# Altium PCB Crabit_V2.PcbDoc (part 1 of 2)
Units mil, origin at the board's own origin, x right, y up, seen from the top; angles counter-clockwise.
Board outline 1492.69 x 1472.87 mil, 4 copper layers (Top Layer, GND, PWR, Bottom Layer), stack 75.156 mil thick; 108 components, 88 nets, 475 pads, 227 vias.
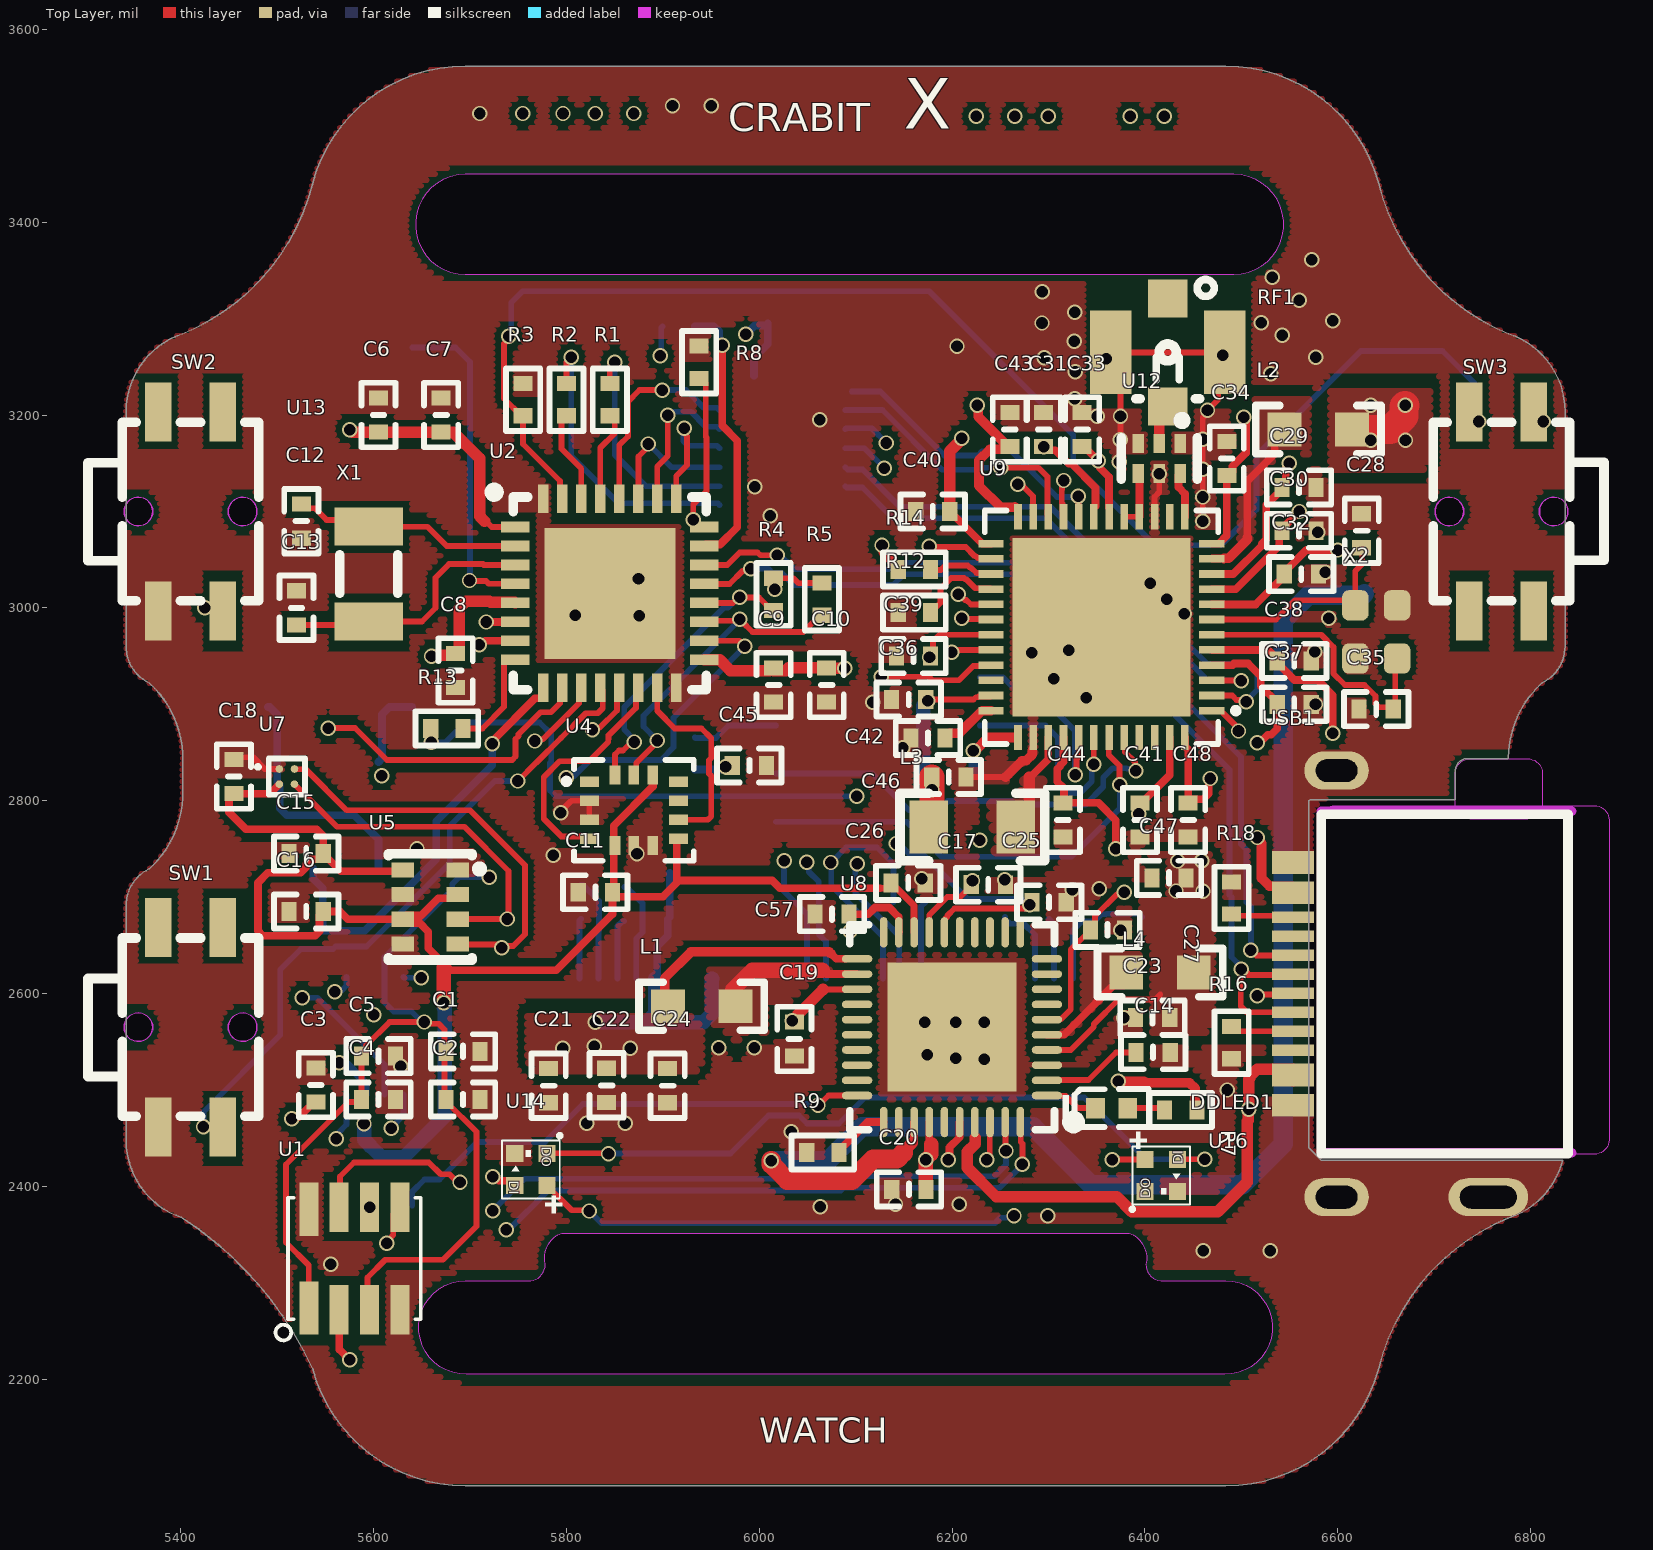
[diagram p0: Top Layer view]
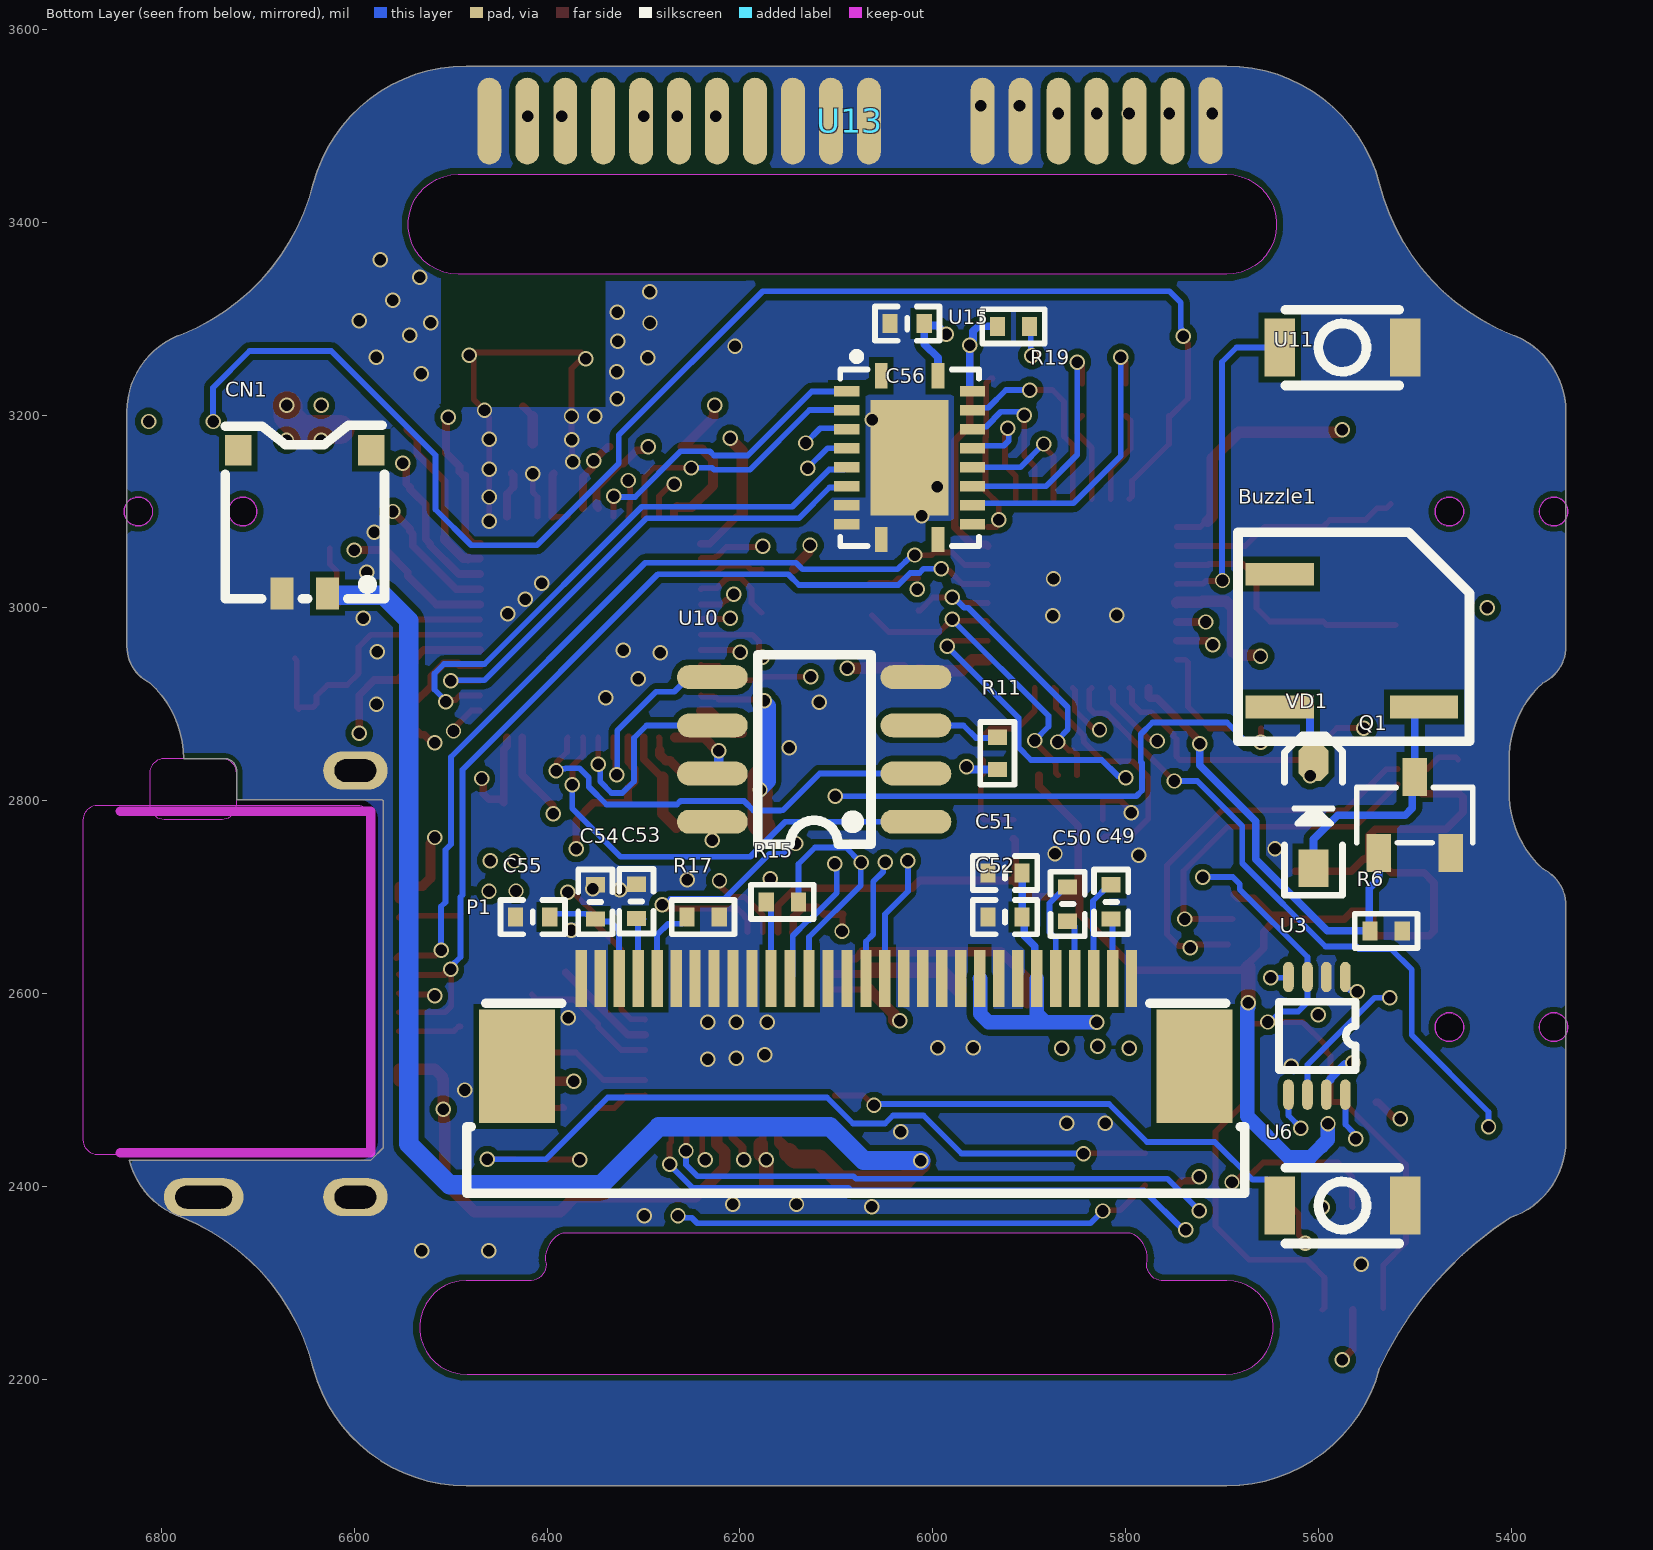
[diagram p1: Bottom Layer view, seen from below]
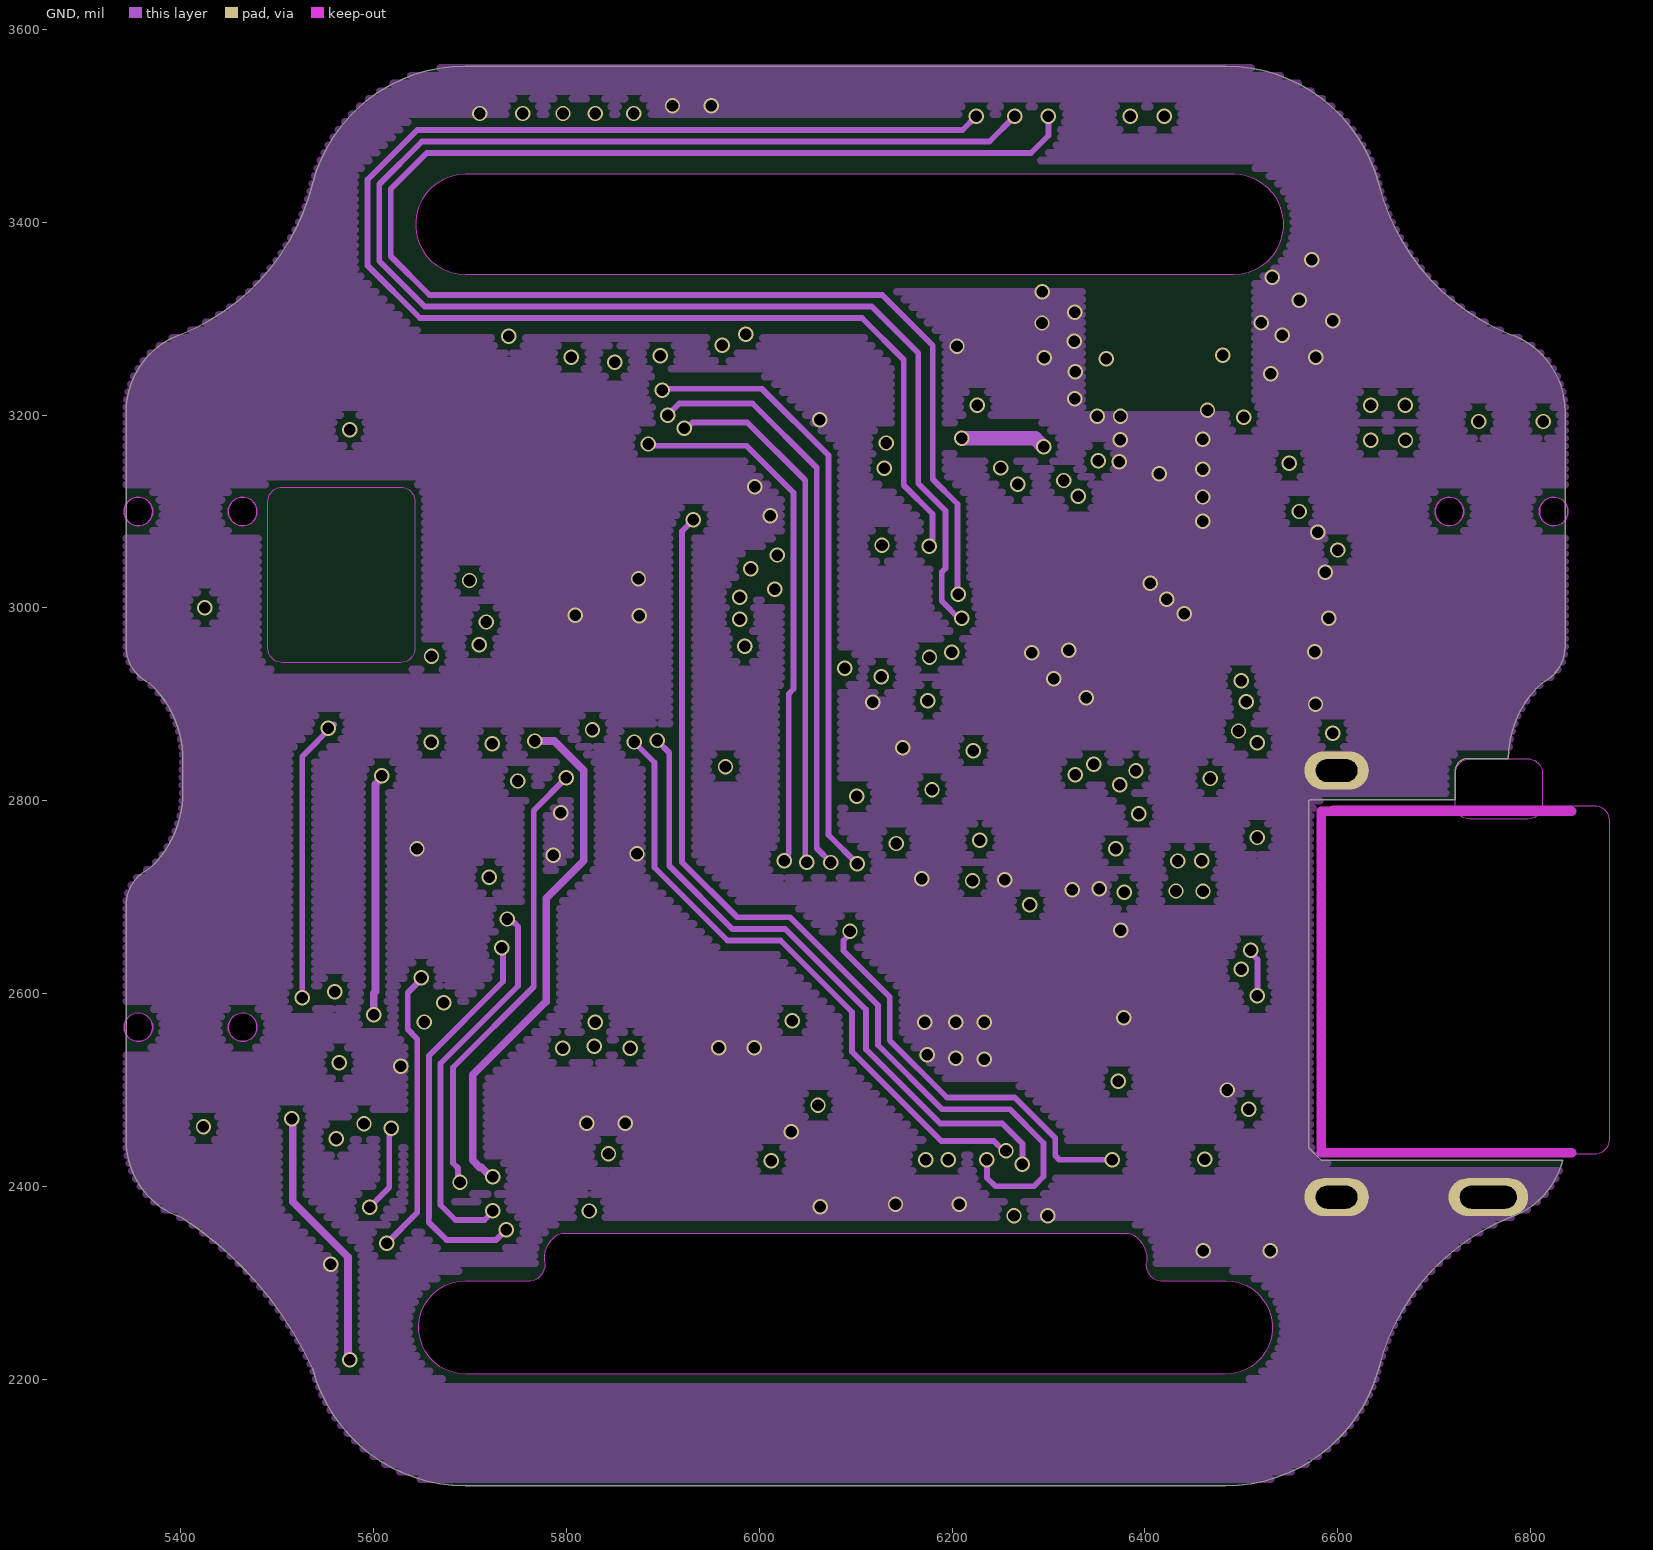
[diagram p2: GND]
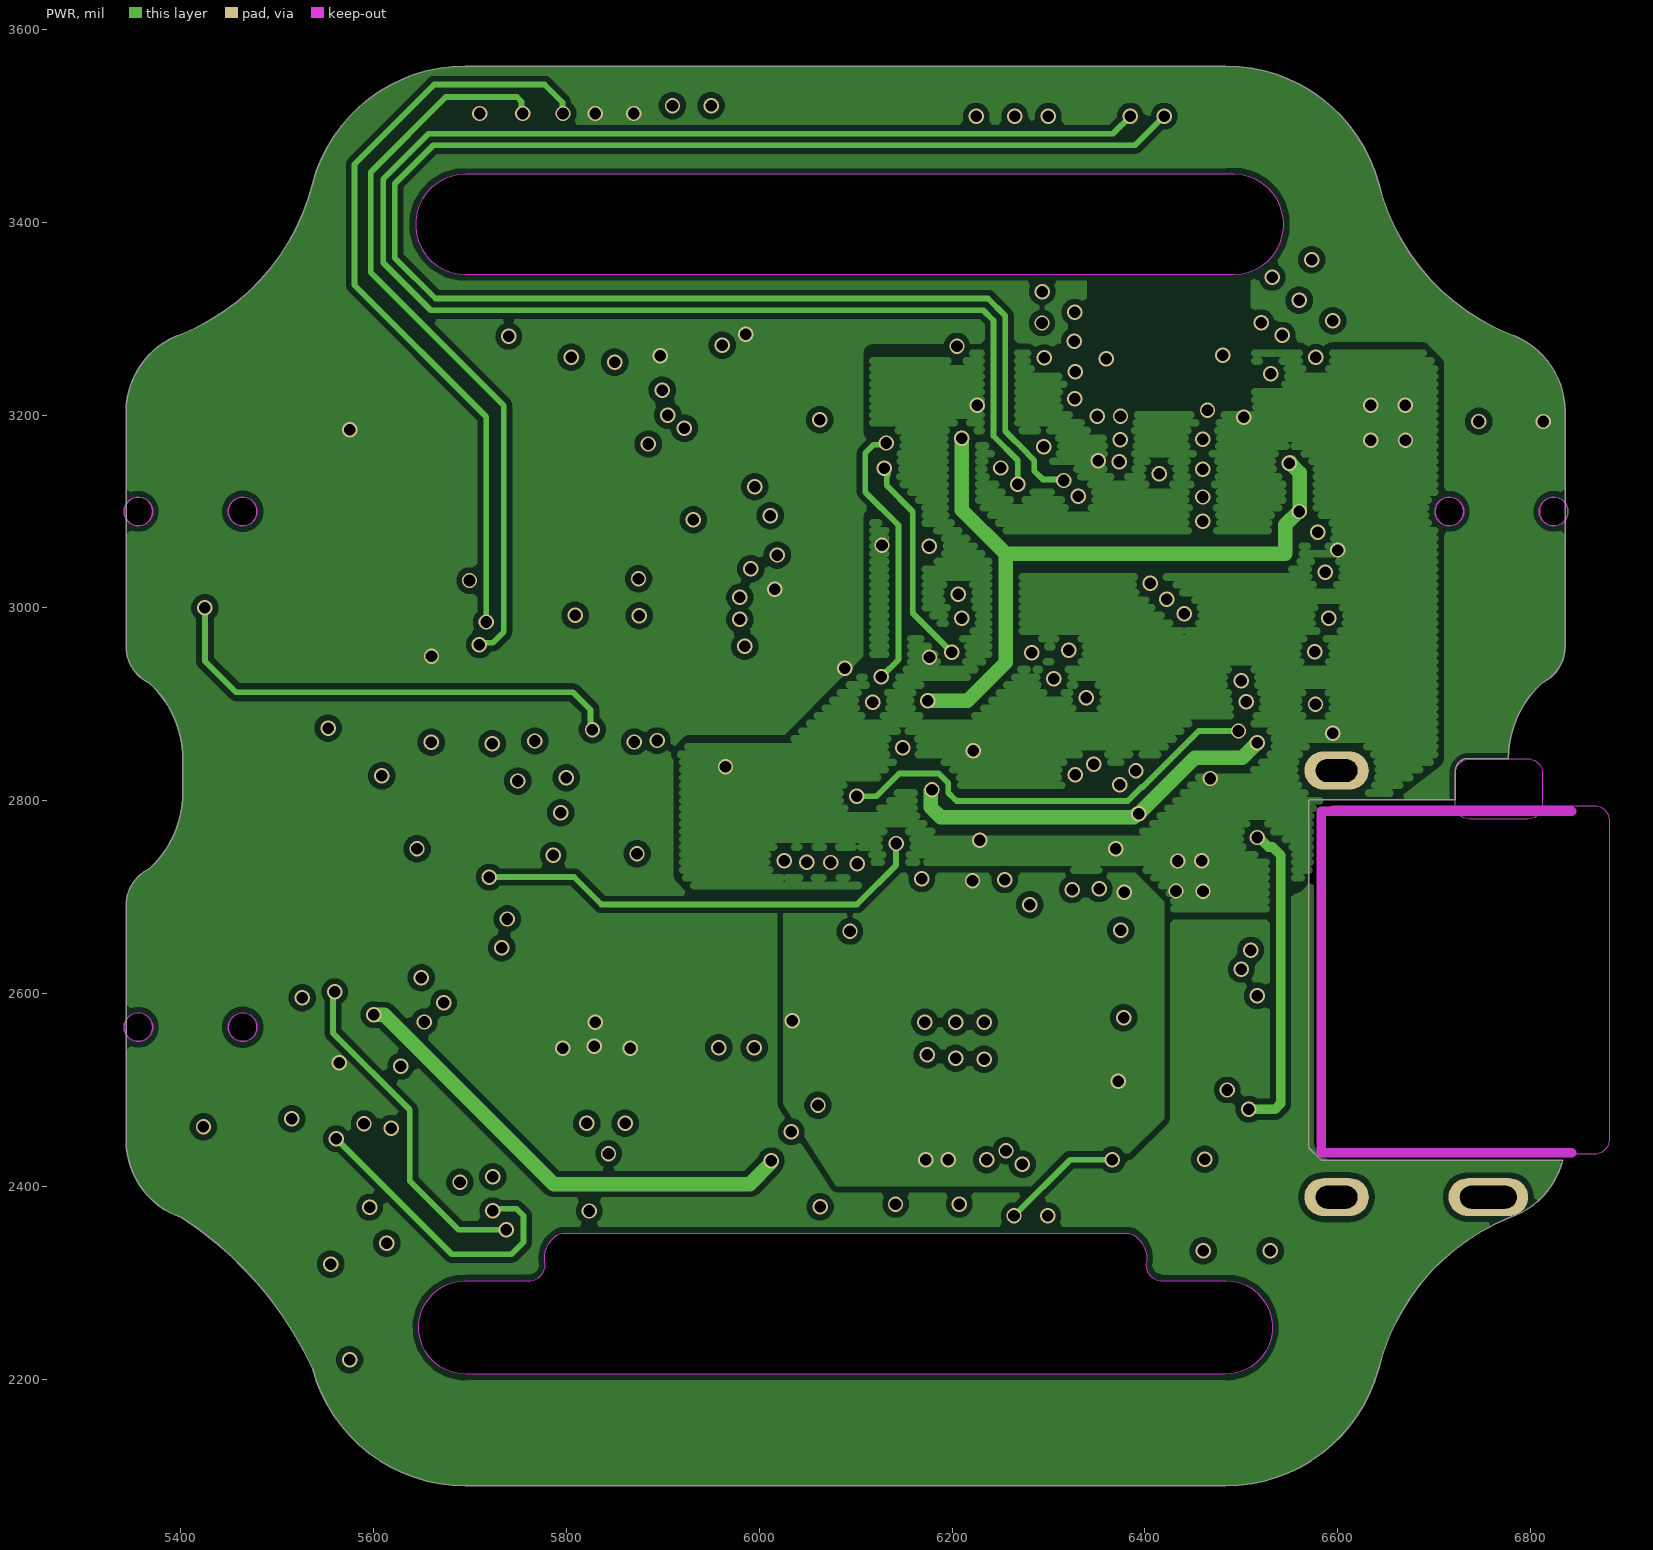
[diagram p3: PWR]
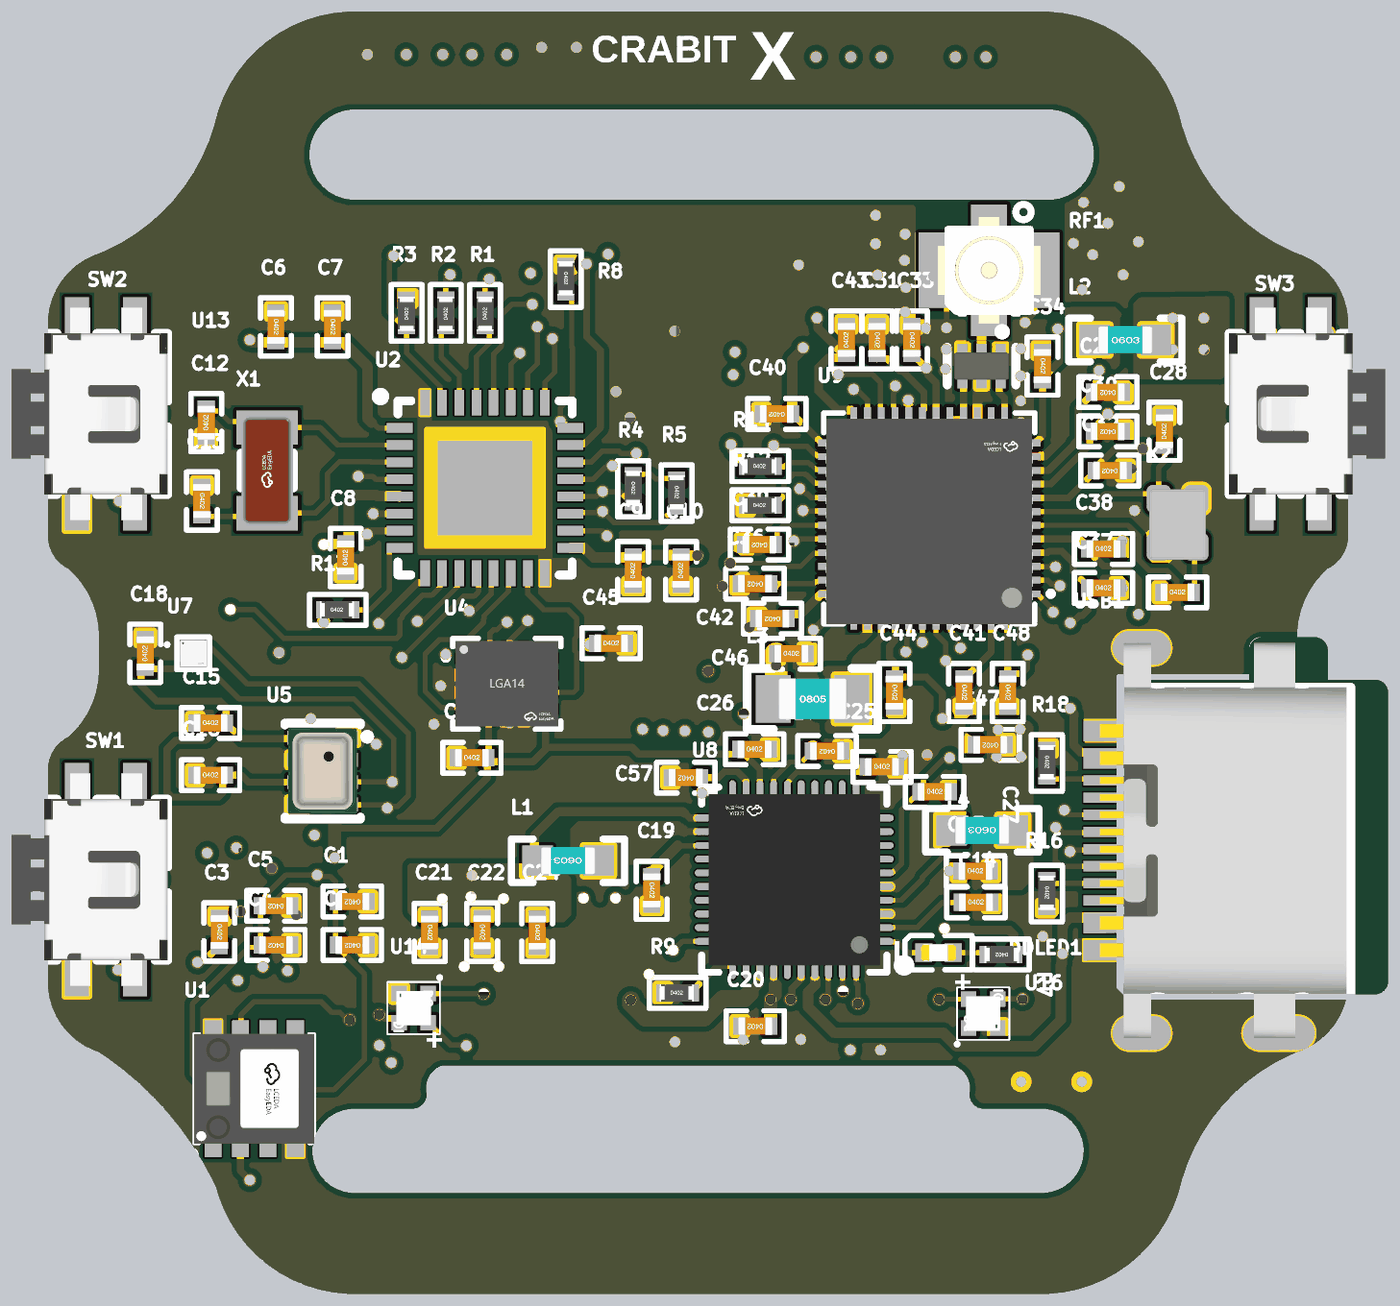
[diagram p5: 3D render of the assembled board from above, using the file's embedded part models]
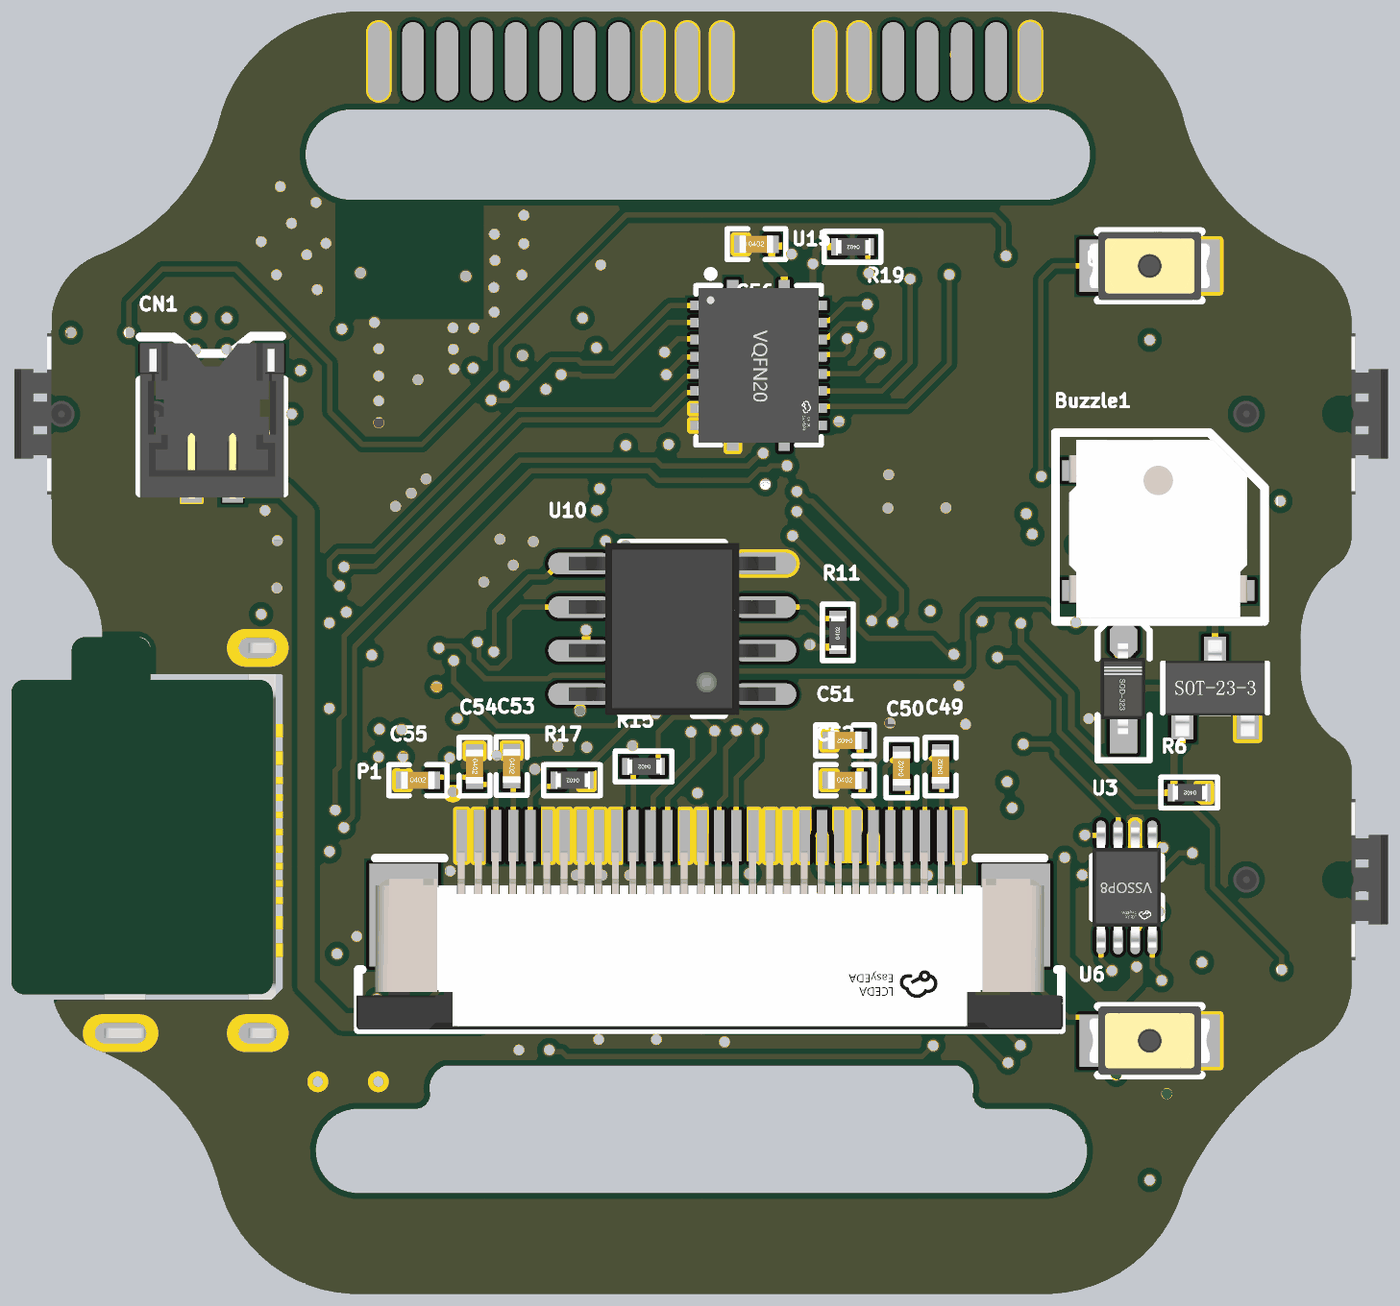
[diagram p6: 3D render of the assembled board from below, using the file's embedded part models]

## Layer stack, top to bottom
Top Solder: solder mask 0.4, Solder Resist, Dk 3.5
Top Layer: signal copper 1.4
Dielectric 2: prepreg 2.8, PP-006, Dk 4.1
GND: signal copper 1.378
Dielectric 1: dielectric 64, FR-4, Dk 4.8
PWR: signal copper 1.378
Dielectric 3: prepreg 2.8, PP-006, Dk 4.1
Bottom Layer: signal copper 1.4
Bottom Solder: solder mask 0.4, Solder Resist, Dk 3.5

## Board outline
5401.41,2367.21 cw(c5195.51,2052.43) 5536.59,2211 ccw(c5695.28,2253.52) 5695.28,2089.23 6483.85,2089.23 ccw(c6483.85,2253.52) 6642.54,2211 cw(c6863.72,2156.19) 6777.72,2367.21 ccw(c6751.13,2447.72) 6833.37,2427.12 6833.32,2427.14 6582.78,2427.14 6570.06,2439.85 6570.06,2799.89 6571.22,2801.05 6722.08,2801.05 6722.08,2831.29 cw(c6734.73,2831.02) 6734.99,2843.66 6777.22,2843.66 cw(c6882.14,2844.02) 6812.05,2922.1 ccw(c6793.66,2960.13) 6835.91,2960.13 6835.91,3203.62 ccw(c6751.13,3203.62) 6777.72,3284.12 cw(c6863.72,3495.14) 6642.54,3440.34 ccw(c6483.85,3397.82) 6483.85,3562.1 5695.28,3562.1 ccw(c5695.28,3397.82) 5536.59,3440.34 cw(c5315.41,3495.14) 5401.41,3284.12 ccw(c5428.01,3203.62) 5343.22,3203.62 5343.22,2960.13 ccw(c5385.47,2960.13) 5367.08,2922.1 cw(c5296.99,2844.02) 5401.81,2839.37 5401.81,2811.97 cw(c5296.99,2807.31) 5367.08,2729.24 ccw(c5385.48,2691.2) 5343.22,2691.2 5343.22,2447.72 ccw(c5428.01,2447.72)
cut-out: 5695.31,3345.89 6193.91,3345.89 6193.94,3345.91 6483.85,3345.91 6483.86,3345.9 6492.16,3345.9 ccw(c6492.16,3397.81) 6492.16,3449.71 6483.86,3449.71 6483.85,3449.72 5695.28,3449.72 ccw(c5695.28,3397.82)
cut-out: 5696.29,2205.08 cw(c5695.28,2253.52) 5695.28,2301.97 5759.97,2301.97 ccw(c5761.27,2318.67) 5778.02,2318.96 cw(c5804.97,2325.49) 5795.26,2351.47 6383.87,2351.47 cw(c6374.16,2325.49) 6401.12,2318.96 ccw(c6417.86,2318.67) 6419.16,2301.97 6483.85,2301.97 cw(c6483.85,2253.52) 6482.84,2205.08
cut-out: 6722.18,2795.85 6722.18,2828.44 cw(c6737.18,2828.44) 6737.18,2843.44 6797.43,2843.44 cw(c6797.43,2828.44) 6812.43,2828.44 6812.43,2795.85 cw(c6797.43,2795.85) 6797.43,2780.85 6737.18,2780.85 cw(c6737.18,2795.85)
cut-out: 6581.74,2448.26 6581.74,2779.74 cw(c6596.74,2779.74) 6596.74,2794.74 6866.66,2794.74 cw(c6866.66,2779.74) 6881.66,2779.74 6881.66,2448.26 cw(c6866.66,2448.26) 6866.66,2433.26 6596.74,2433.26 cw(c6596.74,2448.26)

## Design rules (kind name [scope] priority, off if disabled: settings)
Clearance [All] p1: gap=6 ignorepadtopadclearanceinfootprint=TRUE
PlaneConnect [All] p1: planeconnectstyle=Direct reliefexpansion=20 reliefentries=4 reliefconductorwidth=10 reliefairgap=10
PolygonConnect [All] p1: connectstyle=Direct reliefconductorwidth=10 reliefentries=4 polygonreliefangle="90 Angle" airgapwidth=10
RoutingVias [All] p1: holewidth=12 width=16 viastyle="Through Hole" minholewidth=12 minwidth=16 maxholewidth=12 maxwidth=16
SolderMaskExpansion [All] p1: expansion=4 istentingtop=FALSE
Width [All] p1: maxlimit=30 minlimit=6 preferedwidth=6 minimp=50.000000 maximp=50.000000 favimp=50.000000
29 further rules are at their usual default settings.

## Classes and differential pairs
component class l432: Buzzle1 C1 C2 C3 C4 C5 C6 C7 C8 C9 C10 C11 C12 C13 C14 C15 C16 C17 C18 C19 C20 C21 C22 C23 C24 C25 C26 C27 C57 DDLED1 L1 L4 Q1 R1 R2 R3 R4 R5 R6 R7 R8 R9 SW1 SW2 SW3 U1 U2 U3 U4 U5 U6 U7 U8 U14 U16 VD1 X1
component class nrf8720dn: C28 C29 C30 C31 C32 C33 C34 C35 C36 C37 C38 C39 C40 C41 C42 C43 C44 C45 C46 C47 C48 C49 C50 C51 C52 C53 C54 C55 C56 CN1 L2 L3 P1 R11 R12 R13 R14 R15 R16 R17 R18 R19 RF1 U9 U10 U11 U12 U13 U15 USB1 X2

## Components (designator, comment, footprint, x,y, rotation, side; value= is the part's Value field where it differs from the comment)
Buzzle1 "5020 5*5*2MM SMD无源蜂鸣器" "5020 5*5*2MM SMD��Ƭ������С���ʽ��Դ������" 5565.2,3078.31 r180 bottom
C1 "10uF" "C 0402_L" 5692.71,2540 r180 top
C2 "100nF" "C 0402_L" 5692.71,2490 r180 top
C3 "4.7uF" "C 0402_L" 5540,2505 r270 top
C4 "10uF" "C 0402_L" 5605,2490 r180 top
C5 "100nF" "C 0402_L" 5605,2535 r180 top
C6 "1uF" "C 0402_L" 5605,3200 r270 top
C7 "100nF" "C 0402_L" 5670,3200 r270 top
C8 "4.7uF" "C 0402_L" 5685,2935 r90 top
C9 "100nF" "C 0402_L" 6015,2920 r90 top
C10 "1uF" "C 0402_L" 6070,2920 r90 top
C11 "100nF" "C 0402_L" 5830,2705 r0 top
C12 "12.5pF" "C 0402_L" 5525,3090 r90 top
C13 "12.5pF" "C 0402_L" 5520,3000 r270 top
C14 "1uF" "C 0402_L" 6408.61,2539.01 r0 top
C15 "100nF" "C 0402_L" 5530,2745 r0 top
C16 "100nF" "C 0402_L" 5530,2685 r0 top
C17 "1uF" "C 0402_L" 6237.66,2712.79 r180 top
C18 "1uF" "C 0402_L" 5455,2825 r90 top
C19 "2.2uF" "C 0402_L" 6036.38,2552.74 r270 top
C20 "1uF" "C 0402_L" 6155.26,2396.8 r180 top
C21 "22uF" "C 0402_L" 5781.48,2504.34 r270 top
C22 "22uF" "C 0402_L" 5841.75,2504.67 r270 top
C23 "22uF" "C 0402_L" 6408.05,2574.87 r0 top
C24 "100nF" "C 0402_L" 5904.92,2504.34 r270 top
C25 "2.2uF" "C 0402_L" 6300.72,2694.62 r0 top
C26 "2.2uF" "C 0402_L" 6154.47,2714.77 r0 top
C27 "2.2uF" "C 0402_L" 6361.27,2665.97 r0 top
C28 "10pF" "C 0402_L" 6625,3080 r90 top
C29 "100nF" "C 0402_L" 6560,3125 r180 top
C30 "100nF" "C 0402_L" 6560,3080 r180 top
C31 "100nF" "C 0402_L" 6295,3185 r270 top
C32 "100nF" "C 0402_L" 6562.28,3035 r180 top
C33 "100nF" "C 0402_L" 6335,3185 r270 top
C34 "100nF" "C 0402_L" 6485,3155 r270 top
C35 "10pF" "C 0402_L" 6640,2895 r0 top
C36 "100nF" "C 0402_L" 6155,2905 r180 top
C37 "100nF" "C 0402_L" 6555,2900 r0 top
C38 "100nF" "C 0402_L" 6555,2945 r0 top
C39 "100nF" "C 0402_L" 6160,2950 r180 top
C40 "100nF" "C 0402_L" 6180,3100 r180 top
C41 "100nF" "C 0402_L" 6395,2780 r270 top
C42 "100nF" "C 0402_L" 6175,2865 r180 top
C43 "100nF" "C 0402_L" 6260,3185 r90 top
C44 "100nF" "C 0402_L" 6315,2780 r270 top
C45 "100nF" "C 0402_L" 5989.75,2836.47 r0 top
C46 "10uF" "C 0402_L" 6196.65,2824.54 r0 top
C47 "10uF" "C 0402_L" 6425,2720 r180 top
C48 "100nF" "C 0402_L" 6445,2780 r270 top
C49 "1uF" "C 0402_L" 5815,2695 r90 bottom
C50 "1uF" "C 0402_L" 5860,2692.72 r90 bottom
C51 "2.2uF" "C 0402_L" 5925,2725 r0 bottom
C52 "1uF" "C 0402_L" 5925,2679.26 r180 bottom
C53 "2.2uF" "C 0402_L" 6307.48,2695.55 r270 bottom
C54 "2.2uF" "C 0402_L" 6350,2695 r270 bottom
C55 "1uF" "C 0402_L" 6415,2679.26 r180 bottom
C56 "100nF" "C 0402_L" 6026.5,3294.9 r180 bottom
C57 "2.2uF" "C 0402_L" 6075.53,2682.26 r180 top
CN1 "781710002" CONN-SMD_2P-P1.20_781710002 6651.39,3089.31 r0 bottom
DDLED1 "绿色" LED0402-RD 6365.55,2481.13 r180 top
L1 "1uH" "L 0603" 5940.32,2586.77 r180 top
L2 "4.7uH" "L 0603" 6580,3185 r0 top
L3 "2.2uH" "L 0805" 6221.01,2772.7 r0 top
L4 "1uH" "L 0603" 6415.8,2621.73 r180 top
P1 "AFC07-S30ECC-00" FPC-SMD_AFC07-S30ECC-00 6080,2570 r180 bottom
Q1 "AO3400A" SOT-23-3_L2.9-W1.3-P1.90-LS2.4-BR 5500,2775 r180 bottom
R1 "0R" "R 0402_L" 5845,3215 r90 top
R2 "0R" "R 0402_L" 5800,3215 r90 top
R3 "10K" "R 0402_L" 5755,3215 r90 top
R4 "4.7K" "R 0402_L" 6015,3015 r270 top
R5 "4.7K" "R 0402_L" 6065,3010 r270 top
R6 "10K" "R 0402_L" 5528.7,2664.99 r0 bottom
R7 "10K" "R 0402_L" 6438.21,2479.08 r180 top
R8 "10K" "R 0402_L" 5937.71,3255.81 r270 top
R9 "10K" "R 0402_L" 6065,2435 r0 top
R11 "10K" "R 0402_L" 5933.06,2848.12 r90 bottom
R12 "10K" "R 0402_L" 6160,2995 r0 top
R13 "0R" "R 0402_L" 5675,2875 r0 top
R14 "10K" "R 0402_L" 6160,3040 r0 top
R15 "0R" "R 0402_L" 6155,2695 r0 bottom
R16 "5.1K" "R 0402_L" 6490,2550 r270 top
R17 "560K" "R 0402_L" 6237.29,2679.25 r0 bottom
R18 "5.1K" "R 0402_L" 6490,2700 r270 top
R19 "10K" "R 0402_L" 5915.28,3291.96 r0 bottom
RF1 "3GHz" ANT-SMD_KH-IPEX-K501-29 6423.75,3264.97 r180 top
SW1 "TS-3547SLM" SW-SMD_TS-3547SLM 5410,2565 r270 top
SW2 "TS-3547SLM" SW-SMD_TS-3547SLM 5410,3100 r270 top
SW3 "TS-3547SLM" SW-SMD_TS-3547SLM 6770,3100 r90 top
U1 "PAT9125EL-TKIT" LGA-8_L3.5-W3.2-P0.80-BL 5580,2325 r0 top
U2 "STM32L432KBU6" UFQFPN-32_L5.0-W5.0-P0.50-TL-EP3.5 5845,3015 r0 top
U3 "MTXS0102DCUR" VSSOP-8_L2.1-W2.4-P0.50-LS3.2-BL 5601.46,2556.09 r0 bottom
U4 "QMI8658A" LGA-14L_L3.0-W2.5-P0.50-TL 5870,2790 r0 top
U5 "BMP280" LGA-8_L2.5-W2.0-P0.65_AMP6127 5658.65,2689.79 r0 top
U6 "TC-S3403-2.0-260G" SW-SMD_L3.0-W2.0-LS3.5 5575,2380 r0 bottom
U7 "MMC5603NJ" FLIPCHIP-4_L0.8-W0.8-R2-C2-P0.40-TL 5510,2825 r0 top
U8 "AXP2101" QFN-40_L5.0-W5.0-P0.40-TL-EP3.4 6200,2565 r180 top
U9 "RTL8720DN-VA1-CG" VQFN-48_L6.0-W6.0-P0.40-TL-EP4.7 6355,2980 r180 top
U10 "GD25Q40CTIG" SOP-8_L4.9-W3.9-P1.27-LS6.0-BL 6123.06,2853.12 r90 bottom
U11 "TC-S3403-2.0-260G" SW-SMD_L3.0-W2.0-LS3.5 5575,3270 r180 bottom
U12 "RFDIP1607ALM9T21" XFMR-SMD_6P-L1.6-W0.8-P0.55-BL 6415,3155 r180 top
U13 "91650-11010CHF" "PCIE 1X - single c" 6460,3505 r180 top
U14 "XL-1010RGBC-2812B" LED-SMD_4P-L1.0-W1.0-TL_XL-1010RGBC-WS2812B 5763.08,2417.45 r270 top
U15 "SN74CBTLV3245ARGYR" VQFN-20_L4.5-W3.5-P0.50-BL-EP-1 6023.99,3155.8 r270 bottom
U16 "XL-1010RGBC-2812B" LED-SMD_4P-L1.0-W1.0-TL_XL-1010RGBC-WS2812B 6416.98,2411.19 r90 top
USB1 "TYPE-C 16P CB1.6 073" "USB-C-SMD_SHOU_TYPE-C-16P-CB1.6 -Crabit" 6655,2610 r90 top
VD1 "1N4148" SOD-323 5605,2785 r90 bottom
X1 "32.768kHz" FC-135R_L3.2-W1.5 5595,3035 r90 top
X2 "40MHz" CRYSTAL-SMD_4P-L2.0-W1.6-BL 6640,2975 r90 top

## Footprints (in the part's own frame and the unit in brackets; to place one, negate y for a bottom-side part, rotate by r counter-clockwise, add the part's x,y. Pads: shape width x height; smd on the part's side, far side on the other; paste and mask are expansions set on the pad)
"5020 5*5*2MM SMD��Ƭ������С���ʽ��Դ������" [mm] "5020 5*5*2MM SMD��Ƭ������С���ʽ��Դ������"
  rect 1.8x0.6 smd paste+0 mask+0.102: 1(-1.9,-4.6) 2(1.9,-4.6) 3(-1.9,-1.1)
  silkscreen extent -3,-5.5 3.1,0, body extent -2.6,-5.4 2.6,-0.2, height 2
ANT-SMD_KH-IPEX-K501-29 [mil]
  rect 41.3x39.4 smd: 1(0,-56.1) 4(0,56.1)
  rect 43.3x86.6 smd: 2(-59.1,0) 3(59.1,0)
  silkscreen extent -48,-76 33,48, body extent -59,-61 59,61, height 50
"C 0402_L" [mm] "�޼�����Ƭ����         �Ա�ID:�ƾ���ʯ"
  rect 0.4x0.5 smd: 1(-0.45,0) 2(0.45,0)
  silkscreen extent -0.85,-0.45 0.85,0.45, body extent -0.5,-0.26 0.5,0.26, height 0.53
CONN-SMD_2P-P1.20_781710002 [mm]
  rect 0.6x0.85 smd paste+0 mask+0.05: 1(-0.6,1.887) 2(0.6,1.887)
  rect 0.7x0.8 smd paste+0 mask+0.05: 3(-1.75,-1.887) 4(1.75,-1.887)
  silkscreen extent -2.1,-2.54 2.1,2.03, body extent -2.1,-2.34 2.1,2.19, height 1.45
CRYSTAL-SMD_4P-L2.0-W1.6-BL [mm]
  rrect50% 0.8x0.7 smd: 1(-0.7,-0.55) 2(0.7,-0.55) 3(0.7,0.55) 4(-0.7,0.55)
  body extent -1.08,-0.83 0.97,0.82, height 0.46
FC-135R_L3.2-W1.5 [mm]
  rect 1x1.8 smd: 1(-1.25,0) 2(1.25,0)
  silkscreen extent -0.51,-0.76 0.51,0.76, body extent -1.6,-0.75 1.6,0.75, height 0.8
FLIPCHIP-4_L0.8-W0.8-R2-C2-P0.40-TL [mm]
  round 0.2 smd paste-100 mask+0.051: A1(-0.2,0.2) A2(0.2,0.2) B1(-0.2,-0.2) B2(0.2,-0.2)
  silkscreen extent -0.81,-0.48 0.48,0.48, body extent -0.39,-0.39 0.39,0.39, height 0.61
FPC-SMD_AFC07-S30ECC-00 [mm]
  rect 0.3x1.5 smd: 1(7.27,1.153) 2(6.77,1.153) 3(6.27,1.153) 4(5.77,1.153) 5(5.27,1.153) 6(4.77,1.153) 7(4.27,1.153) 8(3.77,1.153) 9(3.27,1.153) 10(2.77,1.153) 11(2.27,1.153) 12(1.77,1.153) 13(1.27,1.153) 14(0.77,1.153) 15(0.274,1.155) 16(-0.229,1.154) 17(-0.729,1.153) 18(-1.229,1.153) 19(-1.729,1.153) 20(-2.231,1.156) 21(-2.731,1.156) 22(-3.231,1.156) 23(-3.731,1.156) 24(-4.232,1.156) 25(-4.731,1.156) 26(-5.232,1.157) 27(-5.732,1.157) 28(-6.232,1.156) 29(-6.731,1.157) 30(-7.232,1.157)
  rect 2x3 smd: 31(-8.925,-1.157) 32(8.925,-1.157)
  silkscreen extent -10.25,-4.5 10.25,0.5, body extent -10.3,-4.5 10.3,0.7, height 2.01
"L 0603" [mil] "С������Ƭ���        �Ա�ID:�ƾ���ʯ"
  rect 35x35 smd: 1(-35,0) 2(35,0)
  silkscreen extent -65,-25 65,25, body extent -31,-16 31,16, height 31
"L 0805" [mil] "С������Ƭ���        �Ա�ID:�ƾ���ʯ"
  rect 40x55 smd: 1(-45,0) 2(45,0)
  silkscreen extent -75,-35 75,35, body extent -39,-24 39,24, height 35
LED0402-RD [mm]
  rect 0.5x0.54 smd: 1(-0.425,0) 2(0.425,0)
  silkscreen extent -0.98,-0.5 1.28,0.5, body extent -0.51,-0.26 0.51,0.25, height 0.21
LED-SMD_4P-L1.0-W1.0-TL_XL-1010RGBC-WS2812B [mm]
  rect 0.45x0.45 smd: 1(-0.425,0.425) 2(0.425,0.425) 3(-0.425,-0.425) 4(0.425,-0.425)
  silkscreen extent -0.94,-0.76 1.15,0.83, body extent -0.5,-0.5 0.5,0.5, height 0.81
LGA-8_L2.5-W2.0-P0.65_AMP6127 [mm]
  rect 0.6x0.4 smd: 1(0.725,0.975) 2(0.725,0.325) 3(0.725,-0.325) 4(0.725,-0.975) 5(-0.725,-0.975) 6(-0.725,-0.325) 7(-0.725,0.325) 8(-0.725,0.975)
  silkscreen extent -1.1,-1.4 1.4,1.4, body extent -1,-1.25 1,1.25, height 0.96
LGA-8_L3.5-W3.2-P0.80-BL [mm]
  rect 0.5x1.4 smd paste+0 mask+0.05: 1(-1.2,-1.3) 8(-1.2,1.3)
  rect 0.5x1.3 smd paste+0 mask+0.05: 2(-0.4,-1.35) 3(0.4,-1.35) 4(1.2,-1.35) 5(1.2,1.35) 6(0.4,1.35) 7(-0.4,1.35)
  silkscreen extent -2.08,-2.16 1.75,1.6, body extent -1.75,-1.6 1.75,1.6, height 1.01
LGA-14L_L3.0-W2.5-P0.50-TL [mm]
  rect 0.5x0.28 smd: 1(-1.175,0.75) 2(-1.175,0.25) 3(-1.175,-0.25) 4(-1.175,-0.75) 8(1.175,-0.75) 9(1.175,-0.25) 10(1.175,0.25) 11(1.175,0.75)
  rect 0.28x0.5 smd: 5(-0.5,-0.925) 6(0,-0.925) 7(0.5,-0.925) 12(0.5,0.925) 13(0,0.925) 14(-0.5,0.925)
  silkscreen extent -1.85,-1.33 1.58,1.33, body extent -1.5,-1.25 1.5,1.25, height 0.92
"PCIE 1X - single c" [mil]
  oval 24.8x90 smd far side paste+0 mask+2.36: A1(0,0) A2(39.37,0) A3(78.74,0) A4(118.11,0) A5(157.48,0) A6(196.85,0) A7(236.22,0) A8(275.59,0) A9(314.96,0) A10(354.33,0) A11(393.7,0) A12(511.81,0) A13(551.18,0) A14(590.55,0) A15(629.92,0) A16(669.29,0) A17(708.66,0) A18(748.03,-0.4)
QFN-40_L5.0-W5.0-P0.40-TL-EP3.4 [mm]
  oval 0.8x0.2 smd paste-100 mask+0.05: 1(-2.5,1.8) 2(-2.5,1.4) 3(-2.5,1) 4(-2.5,0.6) 5(-2.5,0.2) 6(-2.5,-0.2) 7(-2.5,-0.6) 8(-2.5,-1) 9(-2.5,-1.4) 10(-2.5,-1.8) 21(2.5,-1.8) 22(2.5,-1.4) 23(2.5,-1) 24(2.5,-0.6) 25(2.5,-0.2) 26(2.5,0.2) 27(2.5,0.6) 28(2.5,1) 29(2.5,1.4) 30(2.5,1.8)
  oval 0.2x0.8 smd paste-100 mask+0.05: 11(-1.8,-2.5) 12(-1.4,-2.5) 13(-1,-2.5) 14(-0.6,-2.5) 15(-0.2,-2.5) 16(0.2,-2.5) 17(0.6,-2.5) 18(1,-2.5) 19(1.4,-2.5) 20(1.8,-2.5) 31(1.8,2.5) 32(1.4,2.5) 33(1,2.5) 34(0.6,2.5) 35(0.2,2.5) 36(-0.2,2.5) 37(-0.6,2.5) 38(-1,2.5) 39(-1.4,2.5) 40(-1.8,2.5)
  rect 3.4x3.4 smd paste-100 mask+0.05: 41(0,0)
  silkscreen extent -3.35,-2.7 2.7,2.7, body extent -2.5,-2.5 2.5,2.5, height 0.85
"R 0402_L" [mm] "1/16W��Ƭ����     �Ա�ID:�ƾ���ʯ"
  rect 0.4x0.5 smd: 1(-0.4,0) 2(0.45,0)
  silkscreen extent -0.8,-0.45 0.85,0.45, body extent -0.5,-0.25 0.5,0.25, height 0.3
SOD-323 [mm] "1.8x1.3X0.9mm������ߣ����������ţ�"
  rect 1x0.8 smd: 1(-1.4,0)
  oct 1x0.8 smd: 2(1.4,0)
  silkscreen extent -2.11,-0.76 2.11,0.76, body extent -1.34,-0.63 1.31,0.67, height 1
SOP-8_L4.9-W3.9-P1.27-LS6.0-BL [mil]
  oval 24.8x73.4 smd: 1(-75,-105.6) 2(-25,-105.6) 3(25,-105.6) 4(75,-105.6) 5(75,105.6) 6(25,105.6) 7(-25,105.6) 8(-75,105.6)
  silkscreen extent -98,-59 98,58, body extent -99,-119 99,119, height 63
SOT-23-3_L2.9-W1.3-P1.90-LS2.4-BR [mm]
  rect 0.65x1 smd: 1(-0.95,-0.746) 2(0.95,-0.746) 3(0,1.254)
  silkscreen extent -1.53,-0.47 1.53,0.98, body extent -1.45,-1.15 1.45,1.65, height 1.2
SW-SMD_L3.0-W2.0-LS3.5 [mil]
  rect 31.5x60 smd: 1(-64.98,0) 2(64.98,0)
  silkscreen extent -59,-39 59,39, body extent -69,-39 69,39, height 26
SW-SMD_TS-3547SLM [mm]
  rect 1.55x0.7 smd: 1(-2.625,0.85) 2(2.625,0.85) 3(-2.625,-0.85) 4(2.625,-0.85)
  Keep-Out Layer board cut-out: 0.375,-1.375 0.375,-1.449 0.318,-1.587 0.212,-1.693 0.075,-1.75 -0.075,-1.75 -0.212,-1.693 -0.318,-1.587 -0.375,-1.449 -0.375,-1.375 -0.375,-1.3 -0.318,-1.162 -0.212,-1.057 -0.075,-1 0.075,-1 0.212,-1.057 0.318,-1.162 0.375,-1.3 0.375,-1.375 0.375,-1.375
  Keep-Out Layer board cut-out: 0.375,1.375 0.375,1.3 0.318,1.162 0.212,1.057 0.075,1 -0.075,1 -0.212,1.057 -0.318,1.162 -0.375,1.3 -0.375,1.375 -0.375,1.449 -0.318,1.587 -0.212,1.693 -0.075,1.75 0.075,1.75 0.212,1.693 0.318,1.587 0.375,1.449 0.375,1.375 0.375,1.375
  Keep-Out Layer circle w0.005: c0,-1.375 r0.375
  Keep-Out Layer circle w0.005: c0,1.375 r0.375
  Keep-Out Layer region: 0.375,-1.375 0.375,-1.449 0.318,-1.587 0.212,-1.693 0.075,-1.75 -0.075,-1.75 -0.212,-1.693 -0.318,-1.587 -0.375,-1.449 -0.375,-1.375 -0.375,-1.3 -0.318,-1.162 -0.212,-1.057 -0.075,-1 0.075,-1 0.212,-1.057 0.318,-1.162 0.375,-1.3 0.375,-1.375 0.375,-1.375
  Keep-Out Layer region: 0.375,1.375 0.375,1.3 0.318,1.162 0.212,1.057 0.075,1 -0.075,1 -0.212,1.057 -0.318,1.162 -0.375,1.3 -0.375,1.375 -0.375,1.449 -0.318,1.587 -0.212,1.693 -0.075,1.75 0.075,1.75 0.212,1.693 0.318,1.587 0.375,1.449 0.375,1.375 0.375,1.375
  silkscreen extent -2.35,-2.7 2.35,1.8, body extent -3.1,-2.75 3.1,1.8, height 1.65
UFQFPN-32_L5.0-W5.0-P0.50-TL-EP3.5 [mm]
  rect 0.75x0.28 smd paste-100 mask+0.051: 1(-2.49,1.75) 2(-2.49,1.25) 3(-2.49,0.75) 4(-2.49,0.25) 5(-2.49,-0.25) 6(-2.49,-0.75) 7(-2.49,-1.25) 8(-2.49,-1.75) 17(2.49,-1.75) 18(2.49,-1.25) 19(2.49,-0.75) 20(2.49,-0.25) 21(2.49,0.25) 22(2.49,0.75) 23(2.49,1.25) 24(2.49,1.75)
  rect 0.28x0.75 smd paste-100 mask+0.051: 9(-1.75,-2.49) 10(-1.25,-2.49) 11(-0.75,-2.49) 12(-0.25,-2.49) 13(0.25,-2.49) 14(0.75,-2.49) 15(1.25,-2.49) 16(1.75,-2.49) 25(1.75,2.49) 26(1.25,2.49) 27(0.75,2.49) 28(0.25,2.49) 29(-0.25,2.49) 30(-0.75,2.49) 31(-1.25,2.49) 32(-1.75,2.49)
  rect 3.45x3.45 smd paste-100 mask+0.051: 33(0,0)
  silkscreen extent -3.17,-2.54 2.54,2.79, body extent -2.54,-2.54 2.56,2.56, height 0.6
"USB-C-SMD_SHOU_TYPE-C-16P-CB1.6 -Crabit" [mm]
  oval 1x1.7 hole 0.6 slot 1.1 at 90 deg paste+0 mask+0.05: 25(5.62,1.425) 28(-5.62,1.425)
  oval 1x2.1 hole 0.6 slot 1.5 at 90 deg copper offset 0,0 paste+0 mask+0.05: 27(-5.62,-2.575)
  rect 0.3x1.1 smd paste-100 mask+0.05: A1(-3.35,2.575) A4(-2.55,2.575) A5(-1.25,2.575) A6(-0.25,2.575) A7(0.25,2.575) A8(1.25,2.575) A9(2.55,2.575) A12(3.35,2.575) B1(3.05,2.575) B4(2.25,2.575) B5(1.75,2.575) B6(0.75,2.575) B7(-0.75,2.575) B8(-1.75,2.575) B9(-2.25,2.575) B12(-3.05,2.575)
  Keep-Out Layer lines w0.254: -4.451,1.824 -4.451,-4.776 -4.451,1.824 ; -4.451,1.824 4.549,1.824 ; -4.451,1.824 4.549,1.824 ; 4.549,1.824 4.549,-4.776 4.549,1.824
  silkscreen extent -4.47,-4.67 4.47,1.83, body extent -5.77,-4.55 5.77,2.65, height 1.56
VQFN-20_L4.5-W3.5-P0.50-BL-EP-1 [mm]
  rect 0.665x0.336 smd: 1(-2.157,-0.75) 10(2.157,-0.75) 11(2.157,0.75) 20(-2.157,0.75)
  rect 0.28x0.665 smd: 2(-1.75,-1.658) 3(-1.25,-1.658) 4(-0.75,-1.658) 5(-0.25,-1.658) 6(0.25,-1.658) 7(0.75,-1.658) 8(1.25,-1.658) 9(1.75,-1.658) 12(1.75,1.658) 13(1.25,1.658) 14(0.75,1.658) 15(0.25,1.658) 16(-0.25,1.658) 17(-0.75,1.658) 18(-1.25,1.658) 19(-1.75,1.658)
  rect 3.05x2.05 smd: 21(0,0)
  silkscreen extent -2.77,-1.83 2.33,1.83, body extent -2.26,-1.76 2.26,1.76, height 1.02
VQFN-48_L6.0-W6.0-P0.40-TL-EP4.7 [mil]
  rect 26.2x7.9 smd: 1(-114.5,86.6) 2(-114.5,70.9) 3(-114.5,55.1) 4(-114.5,39.4) 5(-114.5,23.6) 6(-114.5,7.9) 7(-114.5,-7.9) 8(-114.5,-23.6) 9(-114.5,-39.4) 10(-114.5,-55.1) 11(-114.5,-70.9) 12(-114.5,-86.6) 25(114.5,-86.6) 26(114.5,-70.9) 27(114.5,-55.1) 28(114.5,-39.4) 29(114.5,-23.6) 30(114.5,-7.9) 31(114.5,7.9) 32(114.5,23.6) 33(114.5,39.4) 34(114.5,55.1) 35(114.5,70.9) 36(114.5,86.6)
  rect 7.9x26.2 smd: 13(-86.6,-114.5) 14(-70.9,-114.5) 15(-55.1,-114.5) 16(-39.4,-114.5) 17(-23.6,-114.5) 18(-7.9,-114.5) 19(7.9,-114.5) 20(23.6,-114.5) 21(39.4,-114.5) 22(55.1,-114.5) 23(70.9,-114.5) 24(86.6,-114.5) 37(86.6,114.5) 38(70.9,114.5) 39(55.1,114.5) 40(39.4,114.5) 41(23.6,114.5) 42(7.9,114.5) 43(-7.9,114.5) 44(-23.6,114.5) 45(-39.4,114.5) 46(-55.1,114.5) 47(-70.9,114.5) 48(-86.6,114.5)
  rect 185x185 smd: 49(0,0)
  silkscreen extent -142,-121 121,121, body extent -119,-115 119,122, height 34
VSSOP-8_L2.1-W2.4-P0.50-LS3.2-BL [mm]
  oval 0.28x0.8 smd: 1(-0.75,-1.55) 2(-0.25,-1.55) 3(0.25,-1.55) 4(0.75,-1.55) 5(0.75,1.55) 6(0.25,1.55) 7(-0.25,1.55) 8(-0.75,1.55)
  silkscreen extent -1.02,-0.9 1,0.9, body extent -1,-1.76 1,1.76, height 1.05
XFMR-SMD_6P-L1.6-W0.8-P0.55-BL [mil]
  rect 11.8x19.7 smd: 1(-21.7,-15.7) 2(0,-15.7) 3(21.7,-15.7) 4(21.7,15.7) 5(0,15.7) 6(-21.7,15.7)
  silkscreen extent -39,-43 39,22, body extent -31,-16 31,16, height 24

## Part data
Buzzle1: library part "5020 SMD无源蜂鸣器", "5020 5*5*2MM SMD贴片超薄超小电磁式无源蜂鸣器"
C1 C2 C3 C4 C5 C6 C7 C8 C9 C10 C11 C12 C13 C14 C15 C16 C17 C18 C19 C20 C21 C22 C23 C24 C25 C26 C27 C28 C29 C30 C31 C32 C33 C34 C35 C36 C37 C38 C39 C40 C41 C42 C43 C44 C45 C46 C47 C48 C49 C50 C51 C52 C53 C54 C55 C56 C57: library part C, "贴片电容", BOM名称=无极性贴片电容, 唯一出售店铺网址=https://shop463601444.taobao.com, 淘宝ID="封装库来自淘宝 ID：黄晶宝石", 联系售后，技术支持=https://shop463601444.taobao.com
CN1: Color=黑色, Current Rating=1.5A, Flame Retardant Rating=UL94V-0, JLCPCB Part Class=扩展库, LCSC Part Name="1x2P 间距:1.2mm 卧贴", Manufacturer=MOLEX, Operating Temperature=-40℃~+105℃, Voltage Rating=50V, Add into BOM=yes, Contact Material=铜合金, Contact Plating=金, Convert to PCB=yes, Datasheet=https://www.molex.com/content/dam/molex/molex-dot-com/products/automated/en-us/salesdrawingpdf/781/78171/781710002_sd.pdf?inline, Device=781710002, Manufacturer Part=781710002, Mounting Type=卧贴, Number of Pins=2P, Number of PINs Per Row=2, Number of Rows=1, Pins Structure=1x2P, Pitch=1.2mm, Reference Series=-, Row Spacing=-, Supplier=LCSC, Supplier Footprint=SMD,P=1.2mm,卧贴, Supplier Part=C505023, Symbol=781710002
DDLED1: library part LED-SMD, "贴片LED", BOM名称=贴片LED, 学习资源=https://shop463601444.taobao.com, 版权归属="封装库来自淘宝 ID：黄晶宝石"
L1 L2 L3 L4: library part L, "小功率贴片电感", BOM名称=小功率贴片电感, 封装库来自淘宝卖家 ID：黄晶宝石=其他店铺购入均为盗版，不享受售后技术支持服务，请立即申请退款, 淘宝ID="封装库来自淘宝 ID：黄晶宝石", 联系售后=https://shop463601444.taobao.com
P1: Current Rating (Max)=400mA, JLCPCB Part Class=扩展库, LCSC Part Name="抽屉式 上接 P数:30P 间距:0.5mm", Manufacturer=JS(钜硕电子), Operating Temperature=-25℃~+85℃, Rated Voltage (Max)=50V, Add into BOM=yes, Contact Material=磷青铜, Contact Plating=锡, Contact Type=上接, Convert to PCB=yes, Datasheet=https://item.szlcsc.com/datasheet/AFC07-S30ECC-00/11642.html, Device=AFC07-S30ECC-00, FFC, FCB Thickness=0.3mm, Height Above Board=2mm, Locking Feature=抽屉式, Manufacturer Part=AFC07-S30ECC-00, Mounting Type=卧贴, Number of Contacts=30P, Pitch=0.5mm, Supplier=LCSC, Supplier Footprint=SMD,P=0.5mm,卧贴, Supplier Part=C11095, Symbol="FPC 0.5MM 30P Pull type H2.0mm Pick up"
Q1: Current - Continuous Drain(Id)=5.2A, Drain to Source Voltage=30V, Gate Threshold Voltage (Vgs(th))=850mV, Input Capacitance(Ciss)=927pF@15V, JLCPCB Part Class=扩展库, LCSC Part Name=N沟道,电流:5.2A,耐压:30V, Manufacturer=HUASHUO(华朔), Operating Temperature=-55℃~+150℃, Pd - Power Dissipation=1W, Reverse Transfer Capacitance (Crss@Vds)=61pF@15V, Add into BOM=yes, Convert to PCB=yes, Datasheet=https://item.szlcsc.com/datasheet/AO3400A/736021.html, Device=AO3400A, Gate Charge(Qg)=11.7nC@4.5V, Manufacturer Part=AO3400A, Number=1个N沟道, RDS(on)=27mΩ@4.5V,5A, Supplier=LCSC, Supplier Footprint=SOT-23, Supplier Part=C700953, Symbol=AO3400A_C700953
R1 R2 R3 R4 R5 R6 R7 R8 R9 R11 R12 R13 R14 R15 R16 R17 R18 R19: library part R, "贴片电阻", BOM名称=贴片电阻, 封装库来自淘宝卖家 ID：黄晶宝石=其他店铺购入均为盗版，不享受售后技术支持服务，请立即申请退款, 版权归属="来自淘宝 ID：黄晶宝石", 联系售后=https://shop463601444.taobao.com
RF1: library part KH-IPEX-K501-29, "连接器类型:板端;接口类型:内针;端口数量:1;接口直径:2mm;接口长度/高度:1.25mm;频率:3GHz;射频系列:IPEX;阻抗:50Ω;样式:-;工作温度:-40℃~+90℃;", JLCPCB Part Class="Extended Part", LCSC Part Name="IPEX 内针", Manufacturer=kinghelm(金航标), Operating Temperature Range=-40℃~+90℃, AddInBom=yes, Connector Type=板端, ConvertToPcb=yes, Datasheet=https://item.szlcsc.com/datasheet/KH-IPEX-K501-29/402820.html, Device=KH-IPEX-K501-29, FootprintName=ANT-SMD_KH-IPEX-K501-29, Impedance=50Ω, Interface=内针, Interface Diameter=2mm, Interface Length/Height=1.25mm, ManufacturerPart=KH-IPEX-K501-29, ModelId=1390225c983f4fdcaa73eb43ca25e5d4聨0819f05c4eef4c71ace90d822a990e87, ModelName=ANT-SMD_KH-IPEX-K501-29, ModelTransform=118.11,122.8344,0,0,0,0,0,0,0, Number of Ports=1, RF Series=IPEX, Style=-, Supplier=LCSC, Supplier Footprint=SMD, SupplierPart=C411563, Symbol=KH-IPEX-K501-29
SW1 SW2 SW3: Actuator/Cap Color=黑色, Contact Current=50mA, JLCPCB Part Class=扩展库, LCSC Part Name="3.5*4.7mm 按键开关 贴膜中乌龟四脚 有定位  编带", Manufacturer=康深, Operating Force=2.5N, Voltage Rating=12V, Actuator Style=矩形按钮, Add into BOM=yes, Circuit=单刀单掷, Convert to PCB=yes, Datasheet=https://item.szlcsc.com/datasheet/TS-3547SLM/49966945.html, Device=TS-3547SLM, Length=6.2mm, Manufacturer Part=TS-3547SLM, Mounting Type=卧贴, Supplier=LCSC, Supplier Footprint=SMD, Supplier Part=C47734524, Switch Height=1.6mm, Symbol=TS-3547SLM, Termination Style=SMD接片, Width=4.4mm, with Bracket=不带支架, With Lamp=-
U1 U4: JLCPCB Part Class=扩展库, Add into BOM=yes, Convert to PCB=yes, Supplier=LCSC
  U1: Device=PAT9125EL-TKIT, LCSC Part Name=PAT9125EL-TKIT, Manufacturer Part=PAT9125EL-TKIT, Supplier Footprint=LGA-8(3.2x3.5x0.8mm), Supplier Part=C2832657, Symbol=PAT9125EL-TKIT
  U4: Device=QMI8658A, LCSC Part Name=QMI8658A, Manufacturer Part=QMI8658A, Supplier Footprint=LGA-14, Supplier Part=C9900008605, Symbol=QMI8658A
U2: JLCPCB Part Class=扩展库, LCSC Part Name="带FPU的超低功耗80 Mhz Arm Cortex-M4 MCU，具有128-KB Flash存储器和USB", Manufacturer=ST(意法半导体), Voltage - Supply=1.71V~3.6V, ADC (Bit)=12bit, Add into BOM=yes, Applications=-, Convert to PCB=yes, CPU Core=ARM-M4, CPU Maximum Speed=80MHz, DAC (Bit)=12bit, Datasheet=https://item.szlcsc.com/datasheet/STM32L432KBU6/95984.html, Device=STM32L432KBU6, Manufacturer Part=STM32L432KBU6, Number of I/O=26, Program Memory Type=FLASH, Program Storage Size=128KB, Supplier=LCSC, Supplier Footprint=UFQFPN-32(5x5), Supplier Part=C94784, Symbol=STM32L432KBU6
U3: JLCPCB Part Class=扩展库, Manufacturer=MSKSEMI(美森科), Add into BOM=yes, Convert to PCB=yes, Datasheet=https://item.szlcsc.com/datasheet/MTXS0102DCUR/44365554.html, Device=MTXS0102DCUR, LCSC Part Name=MTXS0102DCUR, Manufacturer Part=MTXS0102DCUR, Supplier=LCSC, Supplier Footprint=VSSOP-8, Supplier Part=C42403135, Symbol=MTXS0102DCUR
U5: JLCPCB Part Class=扩展库, LCSC Part Name="BMP280 停产", Manufacturer=Bosch(博世), Operating Temperature=-40℃~+85℃, Standby Current=300nA, Temperature Coefficient of Offset(TCO)=1.5pa/K, Voltage - Supply=1.71V~3.6V, Absolute Accuracy=1hpa, Add into BOM=yes, Convert to PCB=yes, Datasheet=https://item.szlcsc.com/datasheet/BMP280/84455.html, Device=BMP280, Features=待机模式；集成ADC与数字接口；片内温度输出；片内校准与非易失存储, Interface=SPI；I2C, Manufacturer Part=BMP280, Module=-, Pressure range=30Kpa~1.1bar, Relative Accuracy=0.12hpa, Response time=-, Supplier=LCSC, Supplier Footprint=LGA-8(2x2.5), Supplier Part=C83291, Symbol=BMP280
U6 U11: "微动开关", Actuator/Cap Color=黑色, Contact Current=50mA, Insulation Resistance=100MΩ, Manufacturer=HCTL(华灿天禄), Operating Force=2.6N, Operating Temperature=-25℃~+70℃, Voltage Rating (AC)=-, Voltage Rating (DC)=12V, Actuator Style=圆形按钮, Add into BOM=yes, Circuit=单刀单掷, Convert to PCB=yes, Datasheet=https://atta.szlcsc.com/upload/public/pdf/source/20230320/549E467C3F97F31F1E4EF0A0B79060CE.pdf, Device=TC-S3403-2.0-260G, LCSC Part Name=TC-S3403-2.0-260G, Manufacturer Part=TC-S3403-2.0-260G, Mechanical Life=5万次, Mounting Style=立贴, Strike Gundam=不带, Supplier=LCSC, Supplier Footprint=SMD, Supplier Part=C5372844, Switch Height=2mm, Switch Length=3.95mm, Switch Width=3mm, Symbol=TC-S3403-2.0-260G, With Lamp=无
U7: Current - Supply=3.4mA；1.3mA；2.4mA；750uA, JLCPCB Part Class=扩展库, LCSC Part Name=三轴磁传感器, Manufacturer=MEMSIC(美新), Operating Temperature=-40℃~+85℃, Voltage - Supply=1.62V~3.6V, Add into BOM=yes, Convert to PCB=yes, Datasheet=https://item.szlcsc.com/datasheet/MMC5603NJ/391847.html, Device=MMC5603NJ, Interface Type=I2C, Magnetic Sensing Range(X,Y)=±3mT, Magnetic Sensing Range(Z)=±3mT, Manufacturer Part=MMC5603NJ, Output bit=20bit, Supplier=LCSC, Supplier Footprint=WLP-4(0.8x0.8), Supplier Part=C404328, Symbol=MMC5603NJ
U8: JLCPCB Part Class=扩展库, LCSC Part Name="MINI-FIT 系列 TPA 2.0 端子 / 连接器", Manufacturer=x-powers, Add into BOM=yes, Convert to PCB=yes, Datasheet=https://item.szlcsc.com/datasheet/AXP2101/3587325.html, Device=AXP2101, Manufacturer Part=AXP2101, Supplier=LCSC, Supplier Footprint=QFN-40-EP(5x5), Supplier Part=C3036461, Symbol=AXP2101
U10: "接口类型:SPI;存储容量:4Mbit;时钟频率(fc):120MHz;", Clock Frequency=120MHz, JLCPCB Part Class="Extended Part", LCSC Part Name=3.3V统一扇区双路和四路串行闪存, Manufacturer=GigaDevice(兆易创新), Operating Temperature=-, Standby Supply Current=5uA, Voltage - Supply=2.7V~3.6V, AddInBom=yes, Block Erase Time(tBE)=150ms@(32KB), ConvertToPcb=yes, Data Retention - TDR (Year)=20年, Datasheet=https://item.szlcsc.com/datasheet/GD25Q40CTIG/80214.html, Device=GD25Q40CTIG, FootprintName=SOP-8_L4.9-W3.9-P1.27-LS6.0-BL, Interface=SPI, ManufacturerPart=GD25Q40CTIG, Memory Size=4Mbit, ModelId=75c24a7891ee4dd6bdac16a7163ff87e聨0819f05c4eef4c71ace90d822a990e87, ModelName=SOP-8_L4.9-W3.9-P1.27-LS6.0-BL-1, ModelTransform=192.913,236.22,0,0,0,0,0,0,0, Page Programming Time (Tpp)=600us, Program / Erase Cycles=100000次, Supplier=LCSC, Supplier Footprint=SOP-8, SupplierPart=C79077, Symbol=GD25Q40CTIG
U12: "工作电压:-;元件数:-;触发沿:-;计数速率:-;", JLCPCB Part Class="Extended Part", LCSC Part Name="分频器 FDD", Manufacturer=Walsin(华新科), Operating Temperature=-, AddInBom=yes, ConvertToPcb=yes, Count Rate=-, Datasheet=https://item.szlcsc.com/datasheet/RFDIP1607ALM9T21/3456647.html, Device=RFDIP1607ALM9T21, Direction=-, Features=-, FootprintName=XFMR-SMD_6P-L1.6-W0.8-P0.55-BL, Logic Type=-, ManufacturerPart=RFDIP1607ALM9T21, ModelId=dfdfe6a65c7d48819bbe5549325001e2聨0819f05c4eef4c71ace90d822a990e87, ModelName=XFMR-SMD_6P-L1.6-W0.8-H0.6-P0.55-BL, ModelTransform=62.992,31.496,0,0,0,0,0,0.005,0, Number of Bits per Element=-, Number of Elements=-, Power Dissipation=-, Propagation Delay=-, Reset=-, Supplier=LCSC, Supplier Footprint=SMD-6P,1.6x0.8mm, SupplierPart=C2992319, Symbol=RFDIP1607ALM9T21, Timing=-, Trigger Type=-, Voltage - Supply=-
U13: library part 91650-11010CHF_C, JLCPCB Part Class=扩展库, LCSC Part Name="PCIE5.0 PCI-E SMT 立贴 36PIN (X1) 镀金15u 无卤 CAP", Manufacturer=UMaxconn(友贸), Operating Temperature=-40℃~+85℃, Add into BOM=yes, Connector Type=-, Convert to PCB=yes, Datasheet=https://item.szlcsc.com/datasheet/91650-11010CHF/5905330.html, Device=91650-11010CHF, Height Above Board=11.25mm, Manufacturer Part=91650-11010CHF, Mounting Type=立贴, Number of Data Pins=142P, Number of Pins=36P, Supplementary Features=带柱, Supplier=LCSC, Supplier Footprint=SMD,P=1mm, Supplier Part=C5210926, Symbol=91650-11010CHF, Versions="PCI-E 5.0"
U14 U16: ESD Withstand Voltage=2000V, Fixed-Frequency Pwm Mode=1kHz, JLCPCB Part Class=扩展库, LCSC Part Name=XL-1010RGBC-WS2812B, Lens Color=无色透明透镜, Manufacturer=XINGLIGHT(成兴光), Operating Temperature=-20℃~+85℃, Quiescent Current=0.35mA, Voltage - Supply=4.5V~5.5V, Add into BOM=yes, Convert to PCB=yes, Data Transmission Rate=800Kbit/s, Datasheet=https://item.szlcsc.com/datasheet/XL-1010RGBC-2812B/6136402.html, Device=XL-1010RGBC-2812B, Height=1mm, Installation method=正贴, Length=1mm, Luminous Intensity=300mcd；800mcd；200mcd, Manufacturer Part=XL-1010RGBC-2812B, Peak Wavelength=R:625nm；B:470nm；G:525nm, Supplier=LCSC, Supplier Footprint=SMD,1x1mm, Supplier Part=C5349953, Symbol=XL-1010RGBC-WS2812B, Viewing Angle=120°, Wavelength=620nm~625nm；465nm~475nm；520nm~530nm, Width=0.8mm
U15: JLCPCB Part Class=扩展库, LCSC Part Name=低电压八进制FET总线开关，支持部分掉电模式, Manufacturer=TI(德州仪器), Add into BOM=yes, Convert to PCB=yes, Datasheet=https://www.ti.com/cn/lit/gpn/sn74cbtlv3245a, Device=SN74CBTLV3245ARGYR, Manufacturer Part=SN74CBTLV3245ARGYR, Supplier=LCSC, Supplier Footprint=VQFN-20-EP(3.5x4.5), Supplier Part=C2674597, Symbol=SN74CBTLV3245ARGYR
USB1: library part "TYPE-C 16P CB1.6 073_C", Current Rating-Power=3A, Detection color=黑色, JLCPCB Part Class=扩展库, LCSC Part Name=16P卧贴母座, Manufacturer="SHOU HAN(首韩)", Operating Temperature=-25℃~+85℃, Voltage Rating=5V, Add into BOM=yes, Connect-Disconnect Life=5千次, Connector Type=Type-C, Convert to PCB=yes, Datasheet=https://item.szlcsc.com/datasheet/TYPE-C%252016P%2520CB1.6%2520073/3179000.html, Device="TYPE-C 16P CB1.6 073", Gender=母, Manufacturer Part="TYPE-C 16P CB1.6 073", Mounting Type=沉板, Number of Contacts=16P, Number of Ports=1, Protocol Standard="USB 3.1", Supplier=LCSC, Supplier Footprint=SMD, Supplier Part=C2906290, Symbol="TYPE-C 16P CB1.6 073"
VD1: "高速开关二极管", BOM名称=高速开关二极管, 学习资源=www.ooocke.com, 版权归属=源创客
X1: library part Q13FC13500004_C32346, "晶振 32.768k", Equivalent Series Resistance (ESR)=70kΩ, External load capacitor=12.5pF, JLCPCB Part Class="Basic Part", LCSC Part Name="32.768kHz ±20ppm 12.5pF", Manufacturer=EPSON(爱普生), Manufacturer Part=Q13FC13500004, Normal temperature Frequency Tolerance=±20ppm, Operating Temperature=-40℃~+85℃, Add into BOM=yes, Convert to PCB=yes, Crystal Type=贴片晶振, Datasheet=https://atta.szlcsc.com/upload/public/pdf/source/20240418/0E0FF5F0356BA3753F616001439D1416.pdf, Device=Q13FC13500004_C32346, Name=32.768kHz, Supplier=LCSC, Supplier Footprint=SMD3215-2P, Supplier Part=C32346, Symbol=Q13FC1350000400
X2: library part 7D040000I01, "晶振类型: 贴片晶振 / 频率: 40MHz / 常温频差: ±10ppm / 负载电容: 10pF / 类目: 无源晶振 / 编号: C648973", External load capacitor=10pF, Frequency Stability(Full temperature range)=±20ppm, JLCPCB Part Class=扩展库, LCSC Part Name="40MHz ±10ppm 10pF", Manufacturer=HD(浩都频率), Normal temperature Frequency Tolerance=±10ppm, Operating Temperature=-, Add into BOM=yes, Convert to PCB=yes, Crystal Type=贴片晶振, Datasheet=https://atta.szlcsc.com/upload/public/pdf/source/20220223/118C2648083ADD7FA58C5549E27EC941.pdf, Device=7D040000I01, Manufacturer Part=7D040000I01, Supplier=LCSC, Supplier Footprint=SMD2016-4P, Supplier Part=C648973, Symbol=7D040000I01
U9: AddInBom=yes, ConvertToPcb=yes, Device=RTL8720DN-VA1-CG, FootprintName=VQFN-48_L6.0-W6.0-P0.40-TL-EP4.7, LCSC Part Name=RTL8720DN-VA1-CG, ManufacturerPart=RTL8720DN-VA1-CG, ModelId=75d8b471759e4c1a921823be2700eba1聨0819f05c4eef4c71ace90d822a990e87, ModelName=VQFN-48_L6.0-W6.0-P0.40-TL-EP4.7, ModelTransform=237.007,237.007,0,0,0,0,0,0,0, Supplier=LCSC, Supplier Footprint=QFN-48, SupplierPart=C9900165242, Symbol=RTL8720DN-VA1-CG

## Via types
v1: diameter 16, hole 12, Top Layer to Bottom Layer, tented both sides, 224 vias
v2: diameter 16, hole 12, Top Layer to Bottom Layer, 3 vias

## Nets (pads, with @x,y where several pads share a name; then routed paths per layer and width w, separated by ;. In a path a pad name is that pad's centre, name@x,y a point inside that pad or via, vN(x,y) a via of type N, cw(c..) or ccw(c..) an arc to the next point about the centre after c; other vN are vias at no path point)
ALDO1_PAT: C1.2 C2.2 C4.2 C5.2 C25.1 U1.1 U1.3 U3.3 U8.16 | length 1801.6
  Top Layer w6: U1.1@5532.75,2273.82 5532.75,2318.15 5509.18,2341.73 5509.18,2422.57 5573.93,2487.32 5584.6,2487.32 C4.2@5587.29,2490 C5.2@5587.29,2535 5592.16,2539.88 5592.16,2546 5616.58,2570.42 v1(5652.37,2570.42) 5654.28,2568.51 5667.51,2568.51 5673.59,2562.43 5673.59,2540 5673.59,2491.41 C2.2@5675,2490 5675,2488.03 5706.56,2456.47 5706.56,2358.58 5671.86,2323.88 5611.96,2323.88 5593.56,2305.47 5593.56,2274.04 U1.3@5595.74,2271.85 ; U8.16@6192.13,2663.43 6192.13,2675.75 6193.07,2676.68 6193.07,2677.5 6194.93,2679.37 6194.93,2680.6 6202.51,2688.18 6278.13,2688.18 6281.57,2691.62 C25.1@6281.57,2692.77 ; v1(6280.8,2691.99) C25.1@6281.57,2692.77 ; C25.1@6281.57,2694.62 C25.1@6281.57,2692.77 ; C25.1@6283,2694.62 6283,2694.2 C25.1@6281.57,2692.77
  PWR w6: v1(5720.11,2720.7) 5807.91,2720.7 5836.32,2692.28 6101.27,2692.28 6142.01,2733.01 v1(6142.01,2755.56)
  Bottom Layer w6: v1(5652.37,2570.42) 5650.02,2570.42 5639.18,2581.27 5620.89,2581.27 5611.3,2590.85 U3.3@5611.3,2617.11 5611.3,2637.71 5681.49,2707.89 5681.49,2713.47 5688.71,2720.7 v1(5720.11,2720.7) ; v1(6142.01,2755.56) 6144.69,2755.56 6155.37,2744.88 6169.4,2744.88 6216.19,2698.1 6271.99,2698.1 6278.09,2691.99 v1(6280.8,2691.99)
ALDO1_QMI: C11.2 C15.2 C16.2 C18.1 C26.1 U4.5 U4.8 U4.12 U5.2 U5.6 U5.8 U7.B1 U8.18 | length 1777.9
  Top Layer w7: 6125.39,2709.21 6134.69,2709.21 6137.63,2712.14 6140.25,2709.52 6142.22,2709.52 6160.63,2691.1 U8.18@6160.63,2663.43
  Top Layer w8: U7.B1@5502.13,2817.13 5492.28,2807.28 5453.87,2807.28 5450,2803.41 5450,2787.97 5467.64,2770.33 5540.99,2770.33 5547.71,2763.61 C15.2@5547.71,2745 C15.2@5547.71,2743.05 ; U5.8@5623.83,2726.81 5565.9,2726.81 5553.56,2739.15 5551.59,2739.15 C15.2@5547.71,2743.03 ; U5.6@5627.32,2677 5573,2677 5565,2685 C16.2@5547.71,2685 5543.84,2681.12 5543.84,2664.69 5539.15,2660 5485,2660 5480,2665 5480,2715 5490.16,2725.16 5524.3,2725.16 5530.16,2731.02 5530.16,2734.49 5534.84,2739.18 5543.84,2739.18 C15.2@5547.71,2743.05 ; U5.2@5687.19,2702.58 5683.31,2698.7 5667.02,2698.7 5649.19,2680.87 5633.98,2680.87 U5.6@5630.11,2677 5633.98,2673.12 5647.69,2673.12 5656.78,2664.04 5656.78,2646.86 5679.68,2623.97 5789.51,2623.97 5847.71,2682.18 C11.2@5847.71,2705 5847.71,2706.97 5849.02,2708.27 U4.5@5849.02,2752.28 ; U4.5@5850.32,2753.58 U4.5@5849.02,2752.28 ; C11.2@5851.59,2700.44 5900.07,2700.44 5914.46,2714.84 ; U4.12@5889.69,2826.42 5889.69,2814.69 5849.02,2774.02 U4.5@5849.02,2752.28 ; U4.8@5916.26,2760.47 5915.97,2760.47 5914.46,2758.96 5914.46,2714.84 ; 6125.39,2709.21 6021.52,2709.21 6013.58,2717.15 5916.78,2717.15 5914.46,2714.84
  Top Layer w15: v1(5672.52,2590.38) 5672.52,2627.29
  Bottom Layer w15: v1(5590,2465) 5590.19,2464.81 5590.19,2448.32 5596.5,2442.01 5596.5,2441.74 5596.77,2441.74 5608.63,2429.87 5630.93,2429.87 5673.87,2472.81 5673.87,2584.69 5672.71,2585.85 5672.71,2590.19 v1(5672.52,2590.38)
ALDO1_WS: C57.1 U8.19 U14.2 U16.2 | length 1177.2
  Top Layer w6: U14.2@5779.81,2400.72 5805.44,2375.09 v1@5815.78,2375.09 ; C57.1@6093.25,2682.26 6093.69,2681.82 6093.69,2664.86 v1(6094.13,2664.42) ; v1(6366.32,2427.5) 6366.53,2427.71 6400.05,2427.71 U16.2@6400.25,2427.92
  Top Layer w8: C57.1@6093.25,2682.26 6113.12,2682.26 6120.04,2689.18 6134.9,2689.18 6144.82,2679.26 6144.82,2663.49 U8.19@6144.88,2663.43
  GND w6: v1(6094.13,2664.42) 6094.13,2661.72 6087.42,2655.01 6087.42,2644.24 6135.4,2596.27 6135.4,2551.3 6194.69,2492 6264.97,2492 6307,2449.97 6307,2431.81 6311.22,2427.59 6366.23,2427.59 v1(6366.32,2427.5)
  PWR w6: v1(6264.31,2369.34) 6322.56,2427.59 6366.23,2427.59 v1(6366.32,2427.5)
  Bottom Layer w6: v1(5823.6,2374.37) 5836.28,2361.69 6244.31,2361.69 6250.05,2367.43 6262.4,2367.43 v1(6264.31,2369.34)
BAT+: Buzzle1.1 CN1.1 U8.33 VD1.2 | length 2256.4
  Top Layer w8: 6158.71,2445 6160.57,2446.86 6160.57,2466.52 U8.33@6160.63,2466.58
  Top Layer w12: 6149.3,2434.83 6149.3,2435.59 6158.71,2445
  Top Layer w20: v1(6012.36,2426.69) 6012.36,2422.96 6029.17,2406.14 6096.14,2406.14 6118.32,2428.32 6142.79,2428.32 6149.3,2434.83
  GND w8: v1(5600.12,2578) 5600.12,2600.29 5601.83,2602 5601.83,2816.99 5608.57,2823.74 v1(5608.57,2825.9)
  PWR w15: v1(5600.12,2578) 5600.31,2577.81 5611.03,2577.81 5786.68,2402.16 5990.09,2402.16 6012.17,2424.24 6012.17,2426.5 v1(6012.36,2426.69)
  Bottom Layer w8: VD1.2@5605,2840.12 5608.57,2843.68 5608.57,2889.39 5616.38,2897.2 Buzzle1.1@5640,2897.2
  Bottom Layer w20: v1(6012.36,2426.69) 6071.69,2426.69 6106.68,2461.68 6284.11,2461.68 6344.26,2401.52 6501.23,2401.52 6543.56,2443.85 6543.56,2986.83 6569.82,3013.09 6625.95,3013.09 6627.76,3014.9 CN1.1@6627.76,3015
Buzzle: Q1.1 R6.2 U2.9 | length 446.3
  Top Layer w8: v1(5722.95,2859.27) 5724.48,2860.8 5724.48,2863.28 5767.4,2906.21 5774.59,2906.21 5776.1,2907.72 U2.9@5776.1,2916.97
  Bottom Layer w8: Q1.1@5537.4,2730 5537.4,2719.17 5547.29,2709.29 R6.2@5547.29,2665 ; R6.2@5546.41,2664.99 R6.2@5547.29,2665 ; v1(5722.95,2859.27) 5722.95,2836.72 5665,2778.77 5665,2739.41 5590.59,2665 R6.2@5547.29,2665
BW16_EN: R13.2 U2.8 | length 110.8
  Top Layer w6: R13.2@5692.71,2875 5712.81,2875 5735.21,2897.39 5735.21,2943.6 5737.72,2946.11 U2.8@5746.97,2946.11
C_RF: RF1.4 U12.2 | length 42.3
  Top Layer w8: RF1.4@6415,3198.9 RF1.4@6425,3208.9
  Top Layer w11: U12.2@6415,3170.7 RF1.4@6415,3198.9
CHIP_EN: U2.4 U11.1 | length 341.9
  Top Layer w6: v1(5699.46,3028.38) 5699.83,3028.01 5716.46,3028.01 5719.46,3025.01 5746.81,3025.01 U2.4@5746.97,3024.85
  Bottom Layer w6: U11.1@5639.98,3270 5685,3270 5699.85,3255.15 5699.85,3028.77 v1(5699.46,3028.38)
GND: C1.1 C2.1 C3.1 C4.1 C5.1 C6.1 C7.1 C8.1 C9.1 C10.1 C11.1 C12.1 C13.1 C14.2 C15.1 C16.1 C17.1 C18.2 C19.2 C20.2 C21.2 C22.2 C23.1 C24.2 C25.2 C26.2 C27.2 C28.2 C29.1 C30.1 C31.1 C32.1 C33.1 C34.1 C35.1 C36.2 C37.2 C38.2 C39.2 C40.2 C41.2 C42.2 C43.2 C44.2 C45.2 C46.2 C47.2 C48.2 C51.2 C52.1 C53.1 C54.1 C55.1 C56.1 C57.2 CN1.2 P1.1 P1.7 P1.8 P1.10 P1.11 P1.12 P1.13 P1.16 P1.17 P1.21 P1.22 P1.23 P1.24 P1.25 P1.29 P1.30 Q1.2 R3.2 R6.1 R8.1 R9.1 R12.1 R16.2 R17.1 R18.1 RF1.2 RF1.3 SW1.4 SW2.4 U1.4 U1.8 U2.16 U2.32 U2.33 U3.2 U4.2 U4.3 U4.6 U4.7 U5.1 U5.5 U5.7 U6.1 U7.A1 U8.3 U8.41 U9.15 U9.38 U9.49 U10.4 U11.2 U12.1 U12.3 U12.5 U13.A1 U13.A9 U13.A10 U13.A11 U13.A12 U13.A13 U13.A18 U14.3 U15.8 U15.9 U15.10 U15.21 U16.3 USB1.25 USB1.27 USB1.28 USB1.A1 USB1.A12 USB1.B1 USB1.B12 X2.2 X2.4 | length 675.6
  Top Layer w6: C18.2@5455,2842.71 5457.29,2845 5475,2845 5487.13,2832.87 U7.A1@5502.13,2832.87 ; v1(5794.06,2787.56) 5794.06,2789 5804.9,2799.84 U4.2@5823.74,2799.84 U4.3@5823.74,2780.16 ; v1(6168.67,2718.85) 6170.93,2718.85 6171.42,2718.36 C26.2@6171.69,2718.36 ; C46.2@6214.36,2824.54 6255.71,2824.54 ; 6283.35,2851.98 6283.35,2864.75 U9.38@6284.1,2865.5 ; v1(6373.62,3151.63) 6374.04,3152.05 6374.04,3173.87 6374.62,3174.45 6374.62,3198.72 v1(6374.78,3198.88) 6374.78,3248.08 6364.65,3258.22 RF1.3@6364.65,3264.97 6477.98,3264.97 v1(6480.98,3261.97) ; U9.15@6410.1,3094.5 6410.1,3115.1 6415,3120 v1(6415,3139.3) ; v1(6460,3090) v1(6460,3115) v1(6460,3143.65) v1(6460,3175) 6460,3197.29 6465,3202.29 v1(6465,3205) 6476.21,3216.21 6476.21,3257.11 RF1.2@6484.1,3265
  Top Layer w10: 6255.71,2824.54 6272.57,2841.4 6276.91,2841.4 6283.35,2847.84 6283.35,2851.98
  other v1: 5555.31,2319.23 6299.16,2369.34 6063.08,2378.69 6141.36,2381.44 6207.52,2381.44 6033.27,2456.41 5821.14,2465.27 5860.86,2465.27 6485.29,2499.86 5628.3,2524.63 6233.26,2531.96 6203.78,2532.82 6174.37,2536.37 5958,2543.82 5994.78,2543.86 6171.9,2570.14 6203.78,2570.14 6233.26,2570.14 6377.99,2575 6324.52,2707.78 6352.54,2708.44 6254.47,2718.12 5786.36,2743.55 5873.21,2745.05 5645,2750 6148.72,2855 6577.07,2900 6117.58,2902.14 6339.42,2906.87 6305.69,2926.32 6282.6,2953.37 6576.47,2954.49 6320.88,2956.1 6590.57,2989.09 5809.02,2992.17 5875.53,2991.78 6440.81,2993.74 6422.68,3008.98 6405.71,3025.38 5874.76,3030.23 6587.02,3037.09 6579.36,3078.35 6011.45,3095.69 5995.31,3125.71 6374.46,3174.29 6062.84,3195.17 6350.8,3198.63 6327.43,3216.95 6530.57,3242.76 6327.98,3245.16 6360.13,3258.22 6295.67,3259.53 6577.51,3259.79 6205.13,3271.29 6326.6,3276.38 6542.71,3282.86 6293.33,3295.52 6520.55,3295.86 6594.96,3297.92 6327.29,3306.57 6560.1,3319 6293.43,3328.16 6532.06,3342.94 6573.07,3361.14 5710,3512.84 5910,3521 5950,3521
  other v2: 6460.48,2332.92 6530,2332.92 6374.82,2665.78
NetBuzzle1_2: Buzzle1.2 Q1.3 VD1.1 | length 256.9
  Bottom Layer w8: Buzzle1.2@5490.39,2897.2 5492.19,2897.2 5500,2889.39 Q1.3@5500,2824.37 5500,2819.29 5502.61,2816.68 5502.61,2792.39 5510,2785 5580,2785 5605,2760 VD1.1@5605,2729.88
NetC3_2: C3.2 U1.2 | length 363.3
  Top Layer w8: v1(5515,2470) 5516.53,2471.53 5522.27,2471.53 5538.03,2487.29 C3.2@5540,2487.29 ; U1.2@5564.25,2271.85 5564.25,2230.75 v1(5575,2220)
  GND w8: v1(5515,2470) 5516.03,2468.97 5516.03,2383.97 5573.31,2326.69 5573.31,2227.34 5573.47,2227.19 5573.47,2221.53 v1(5575,2220)
NetC14_1: C14.1 U8.2 | length 104.5
  Top Layer w6: U8.2@6298.43,2509.88 6298.78,2510.24 6341.47,2510.24 6369.96,2538.73 6390.61,2538.73 C14.1@6390.89,2539.01
NetC28_1: C28.1 U9.7 X2.3 | length 221.6
  Top Layer w6: U9.7@6469.5,2987.9 6535.93,2987.9 6556.03,3008 6612.91,3008 X2.3@6618.35,3002.56 6618.35,3038.35 6625.46,3045.46 C28.1@6625.46,3061.82
NetC35_2: C35.2 U9.6 X2.1 | length 292.2
  Top Layer w6: U9.6@6469.5,2972.1 6582.9,2972.1 6595.57,2959.43 6595.57,2932 6607.57,2920 6627.73,2920 6639.16,2908.57 6639.16,2900.48 6642.67,2896.97 6655.74,2896.97 C35.2@6657.71,2895 ; C35.2@6659.68,2896.97 6659.68,2945.47 X2.1@6661.65,2947.44
NetC49_1: C49.1 P1.2 | length 62.5
  Bottom Layer w6: P1.2@5813.45,2615.41 5813.45,2675.74 C49.1@5815,2677.28
NetC49_2: C49.2 P1.3 | length 106.6
  Bottom Layer w6: C49.2@5815,2712.71 5816.97,2712.71 5833.84,2695.84 5833.84,2665.68 5833.14,2664.97 P1.3@5833.14,2615.41
NetC50_1: C50.1 P1.4 | length 63.7
  Bottom Layer w6: P1.4@5852.82,2615.41 5852.82,2669.79 5858.03,2675 C50.1@5860,2675
NetC50_2: C50.2 P1.5 | length 106.6
  Bottom Layer w6: C50.2@5860,2710.43 5861.97,2710.43 5878.84,2693.55 5878.84,2663.4 5872.51,2657.06 P1.5@5872.51,2615.41
NetC53_2: C53.2 P1.27 | length 64.5
  Bottom Layer w6: C53.2@6300,2677.29 6300.79,2677.29 6305.66,2672.41 P1.27@6305.66,2615.57
NetC54_2: C54.2 C55.2 P1.28 | length 130.4
  Bottom Layer w6: P1.28@6325.34,2615.53 6325.34,2665.34 6334.68,2674.68 6347.39,2674.68 C54.2@6350,2677.29 6354.88,2682.16 6359.74,2682.16 6360.36,2682.78 6393.76,2682.78 C55.2@6397.29,2679.26
NetDDLED1_1: DDLED1.1 R7.2 | length 41.1
  Top Layer w6: DDLED1.1@6383.95,2482.8 DDLED1.1@6382.28,2481.13 6419.26,2481.13 R7.2@6420.5,2482.37
NetDDLED1_2: DDLED1.2 U8.1 | length 55.8
  Top Layer w6: U8.1@6298.43,2494.13 6298.78,2493.77 6317.88,2493.77 6330.52,2481.13 DDLED1.2@6348.82,2481.13
NetL1_1: L1.1 U8.22 | length 138.9
  Top Layer w8: 6065.27,2624.12 6069.27,2620.12 U8.22@6101.57,2620.12
  Top Layer w16: L1.1@5972.65,2603.99 5992.78,2624.12 6065.27,2624.12
NetL2_1: L2.1 U9.11 | length 174.9
  Top Layer w8: U9.11@6469.8,3051.2 U9.11@6481.86,3051.2 ; 6506.28,3073.19 6506.28,3131.28 6534.73,3159.73 6534.73,3174.73 L2.1@6545,3185
  Top Layer w10: U9.11@6481.86,3051.2 6482.32,3051.65 6487.16,3051.65 6506.28,3070.77 6506.28,3073.19
NetL3_2: L3.2 U9.39 | length 107.5
  Top Layer w8: 6280.01,2824.34 6282.06,2826.4 6283.12,2826.4 6299.85,2843.13 6299.85,2865.45 U9.39@6299.9,2865.5
  Top Layer w12: L3.2@6266.01,2772.7 6280.01,2786.7 6280.01,2824.34
NetL4_2: L4.2 U8.5 | length 109.1
  Top Layer w8: U8.5@6298.43,2557.13 6298.49,2557.19 6316.26,2557.19 L4.2@6380.8,2621.73
NetP1_20: P1.20 R15.2 | length 81.5
  Bottom Layer w6: P1.20@6167.84,2615.53 6167.84,2690.12 R15.2@6172.71,2695
NetP1_26: P1.26 R17.2 | length 85.1
  Bottom Layer w6: R17.2@6255,2679.26 6255,2677.29 6259.87,2672.41 6274.43,2672.41 6285.98,2660.86 P1.26@6285.98,2615.56
NetR11_2: R11.2 U10.3 | length 90.2
  Bottom Layer w6: R11.2@5933.06,2865.83 5933.89,2865 5955,2865 5968.12,2878.12 U10.3@6017.46,2878.12
NetR13_1: R13.1 U9.1 | length 1018.7
  Top Layer w6: R13.1@5659.25,2875 5659.48,2874.76 5659.48,2860.71 v1(5659.72,2860.47) ; U9.1@6469.5,2893.4 6478.65,2893.4 6494.89,2877.16 v1@6494.89,2877.01
  PWR w6: v1(6101.34,2804.56) 6121.51,2804.56 6145.26,2828.3 6186.22,2828.3 6196.18,2818.34 6196.18,2808.24 6203.08,2801.35 6204.85,2799.57 6382.21,2799.57 6396.9,2814.26 6397.84,2814.26 6455.86,2872.28 v1(6497.19,2872.28)
  Bottom Layer w6: v1(5659.72,2860.47) 5674.19,2860.47 5694.89,2881.17 5772.07,2881.17 5784.31,2868.94 5784.31,2840.46 5782.9,2839.06 5782.9,2810.58 5788.91,2804.56 v1(6101.34,2804.56)
NetR16_1: R16.1 USB1.A5 | length 65.7
  Top Layer w6: R16.1@6490,2565.75 6491.97,2565.75 6496.93,2560.79 USB1.A5@6553.62,2560.79
NetR18_2: R18.2 USB1.B5 | length 65
  Top Layer w6: R18.2@6490,2682.29 6491.69,2680.59 6551.93,2680.59 USB1.B5@6553.62,2678.9
NetU14_1: U14.1 U16.4 | length 769
  Top Layer w6: U14.1@5779.8,2434.18 v1@5843.38,2434.18 ; U16.4@6433.71,2427.92 v1(6462.16,2427.94)
  Top Layer w8: v1@5843.38,2434.18 v1(5843.65,2433.9) v1@5843.93,2433.63 ; v1(6462.16,2427.94) v1@6462.3,2427.79
  Bottom Layer w6: v1(5843.65,2433.9) 5970.19,2433.9 6009.69,2473.41 6041.12,2473.41 6049.46,2465.07 6082.65,2465.07 6109.58,2492 6337.21,2492 6401.26,2427.94 v1(6462.16,2427.94)
OLED_DC: P1.15 U2.25 U15.16 | length 812.1
  Top Layer w6: U2.25@5913.9,3113.03 5913.9,3136.79 5925.09,3147.98 5925.09,3178 5924.29,3178.79 5924.29,3184.6 v1(5922.38,3186.51)
  GND w6: v1(5922.38,3186.51) 5925.01,3186.51 5930.9,3192.4 5987.6,3192.4 6047.72,3132.28 6047.72,2738.02 v1(6049.48,2736.26)
  Bottom Layer w6: v1(5922.38,3186.51) 5921.16,3185.29 5921.16,3173.25 5926.26,3168.15 5956.22,3168.15 U15.16@5958.73,3165.64 ; v1(6049.48,2736.26) 6051.39,2734.34 6051.39,2726.33 6061.68,2716.04 6061.68,2661.52 6069.2,2653.99 P1.15@6069.2,2615.46